# Altium PCB AmbientPro_Main_Board_V1.0.PcbDoc (part 1 of 5)
Units mm, origin at the board's own origin, x right, y up, seen from the top; angles counter-clockwise.
Board outline 100 x 100 mm, 4 copper layers (Top Layer, GND, PWR, Bottom Layer), stack 1.566 mm thick; 176 components, 124 nets, 570 pads, 283 vias.
Unrouted connection lines stored in the file: 133.
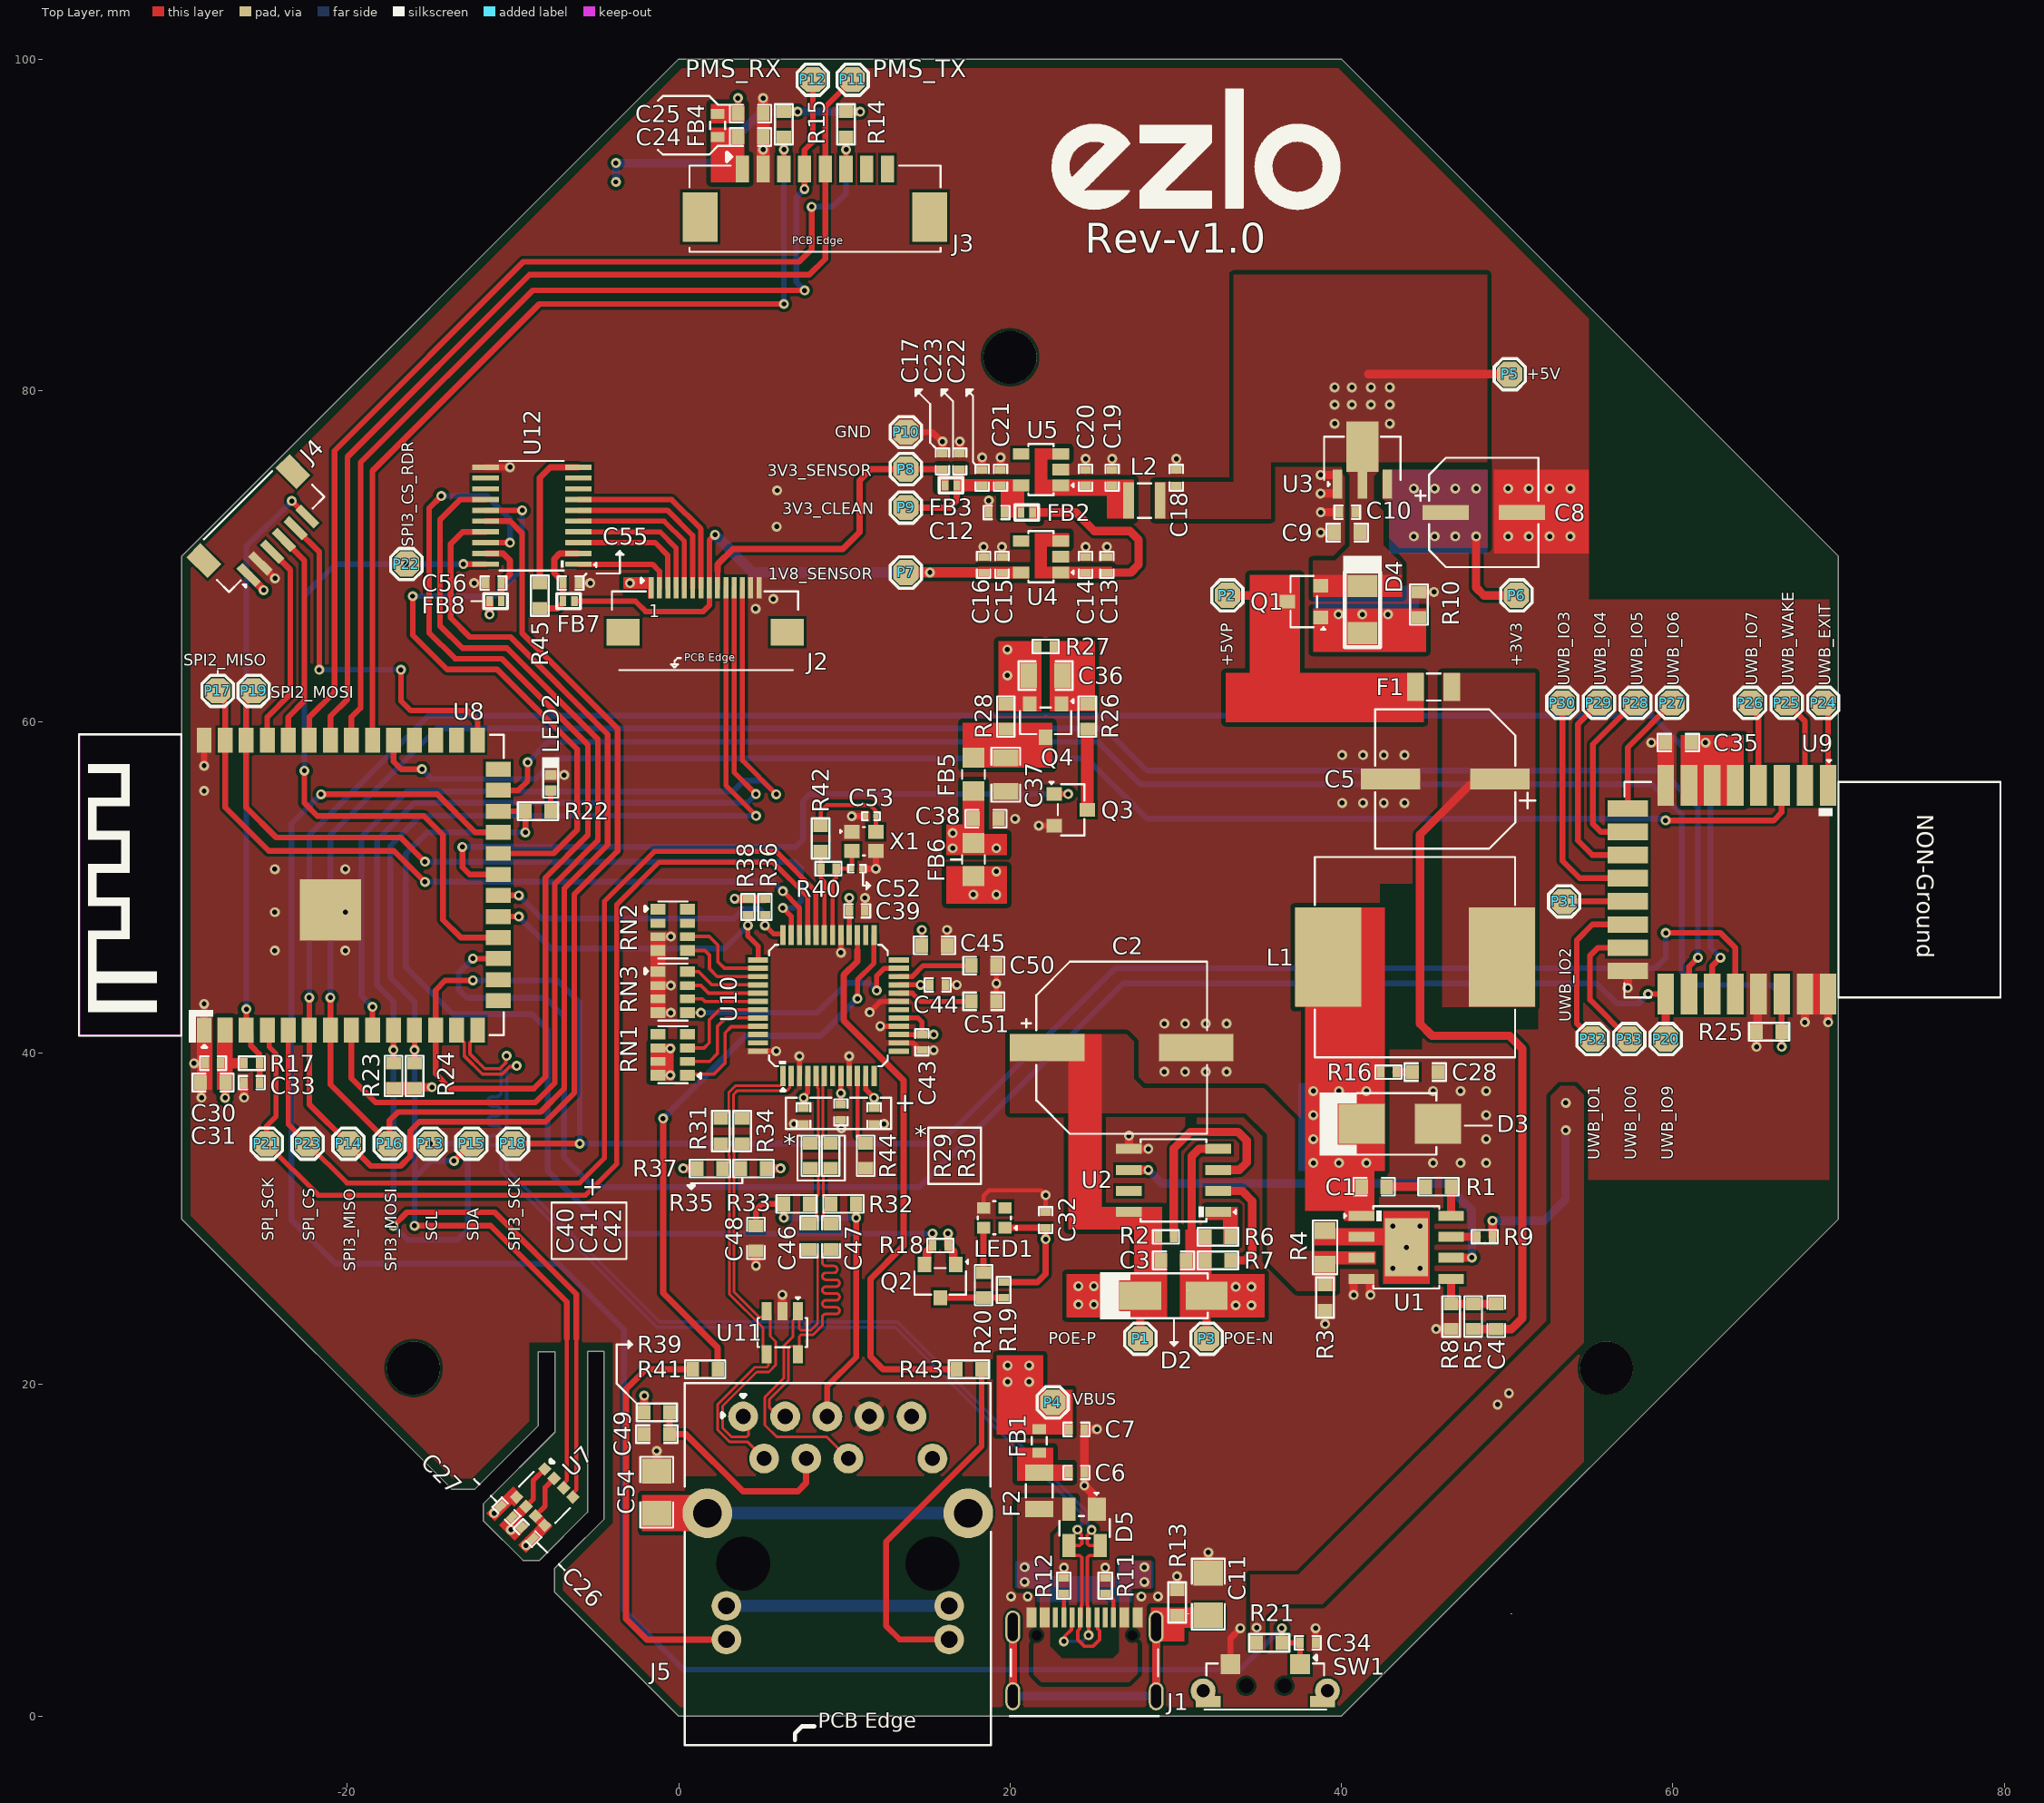
[diagram p0: Top Layer view]
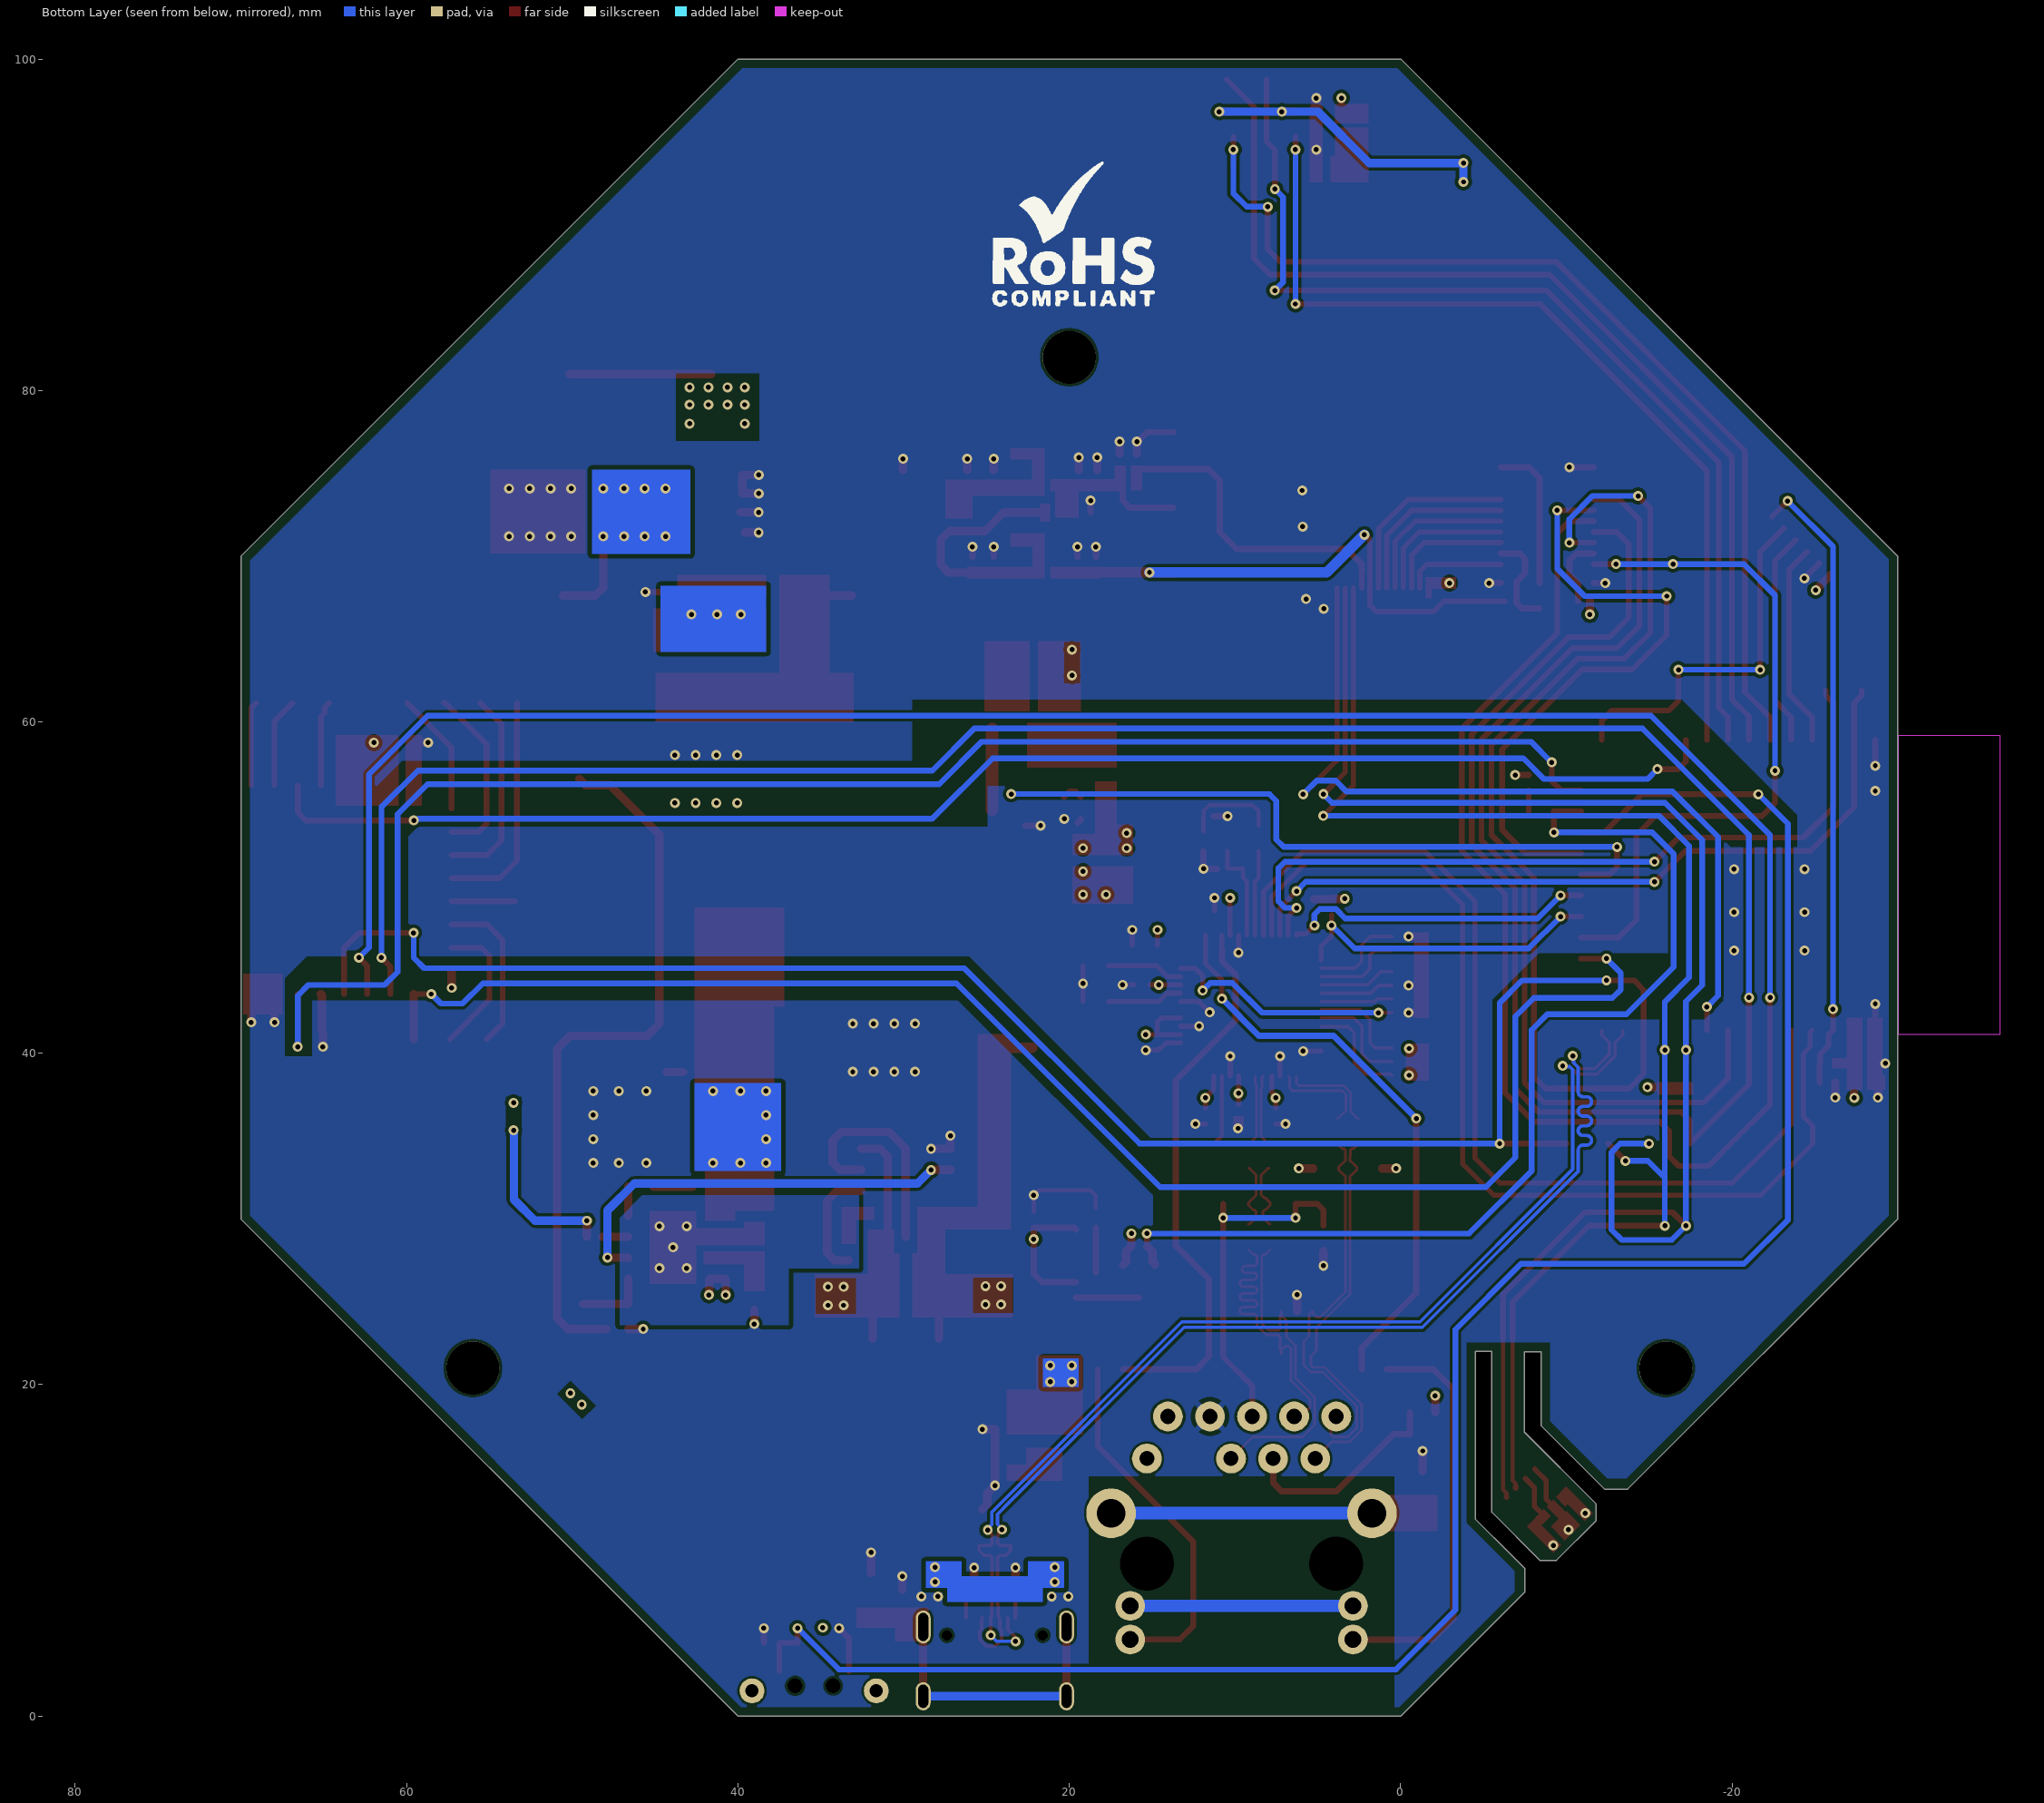
[diagram p1: Bottom Layer view, seen from below]
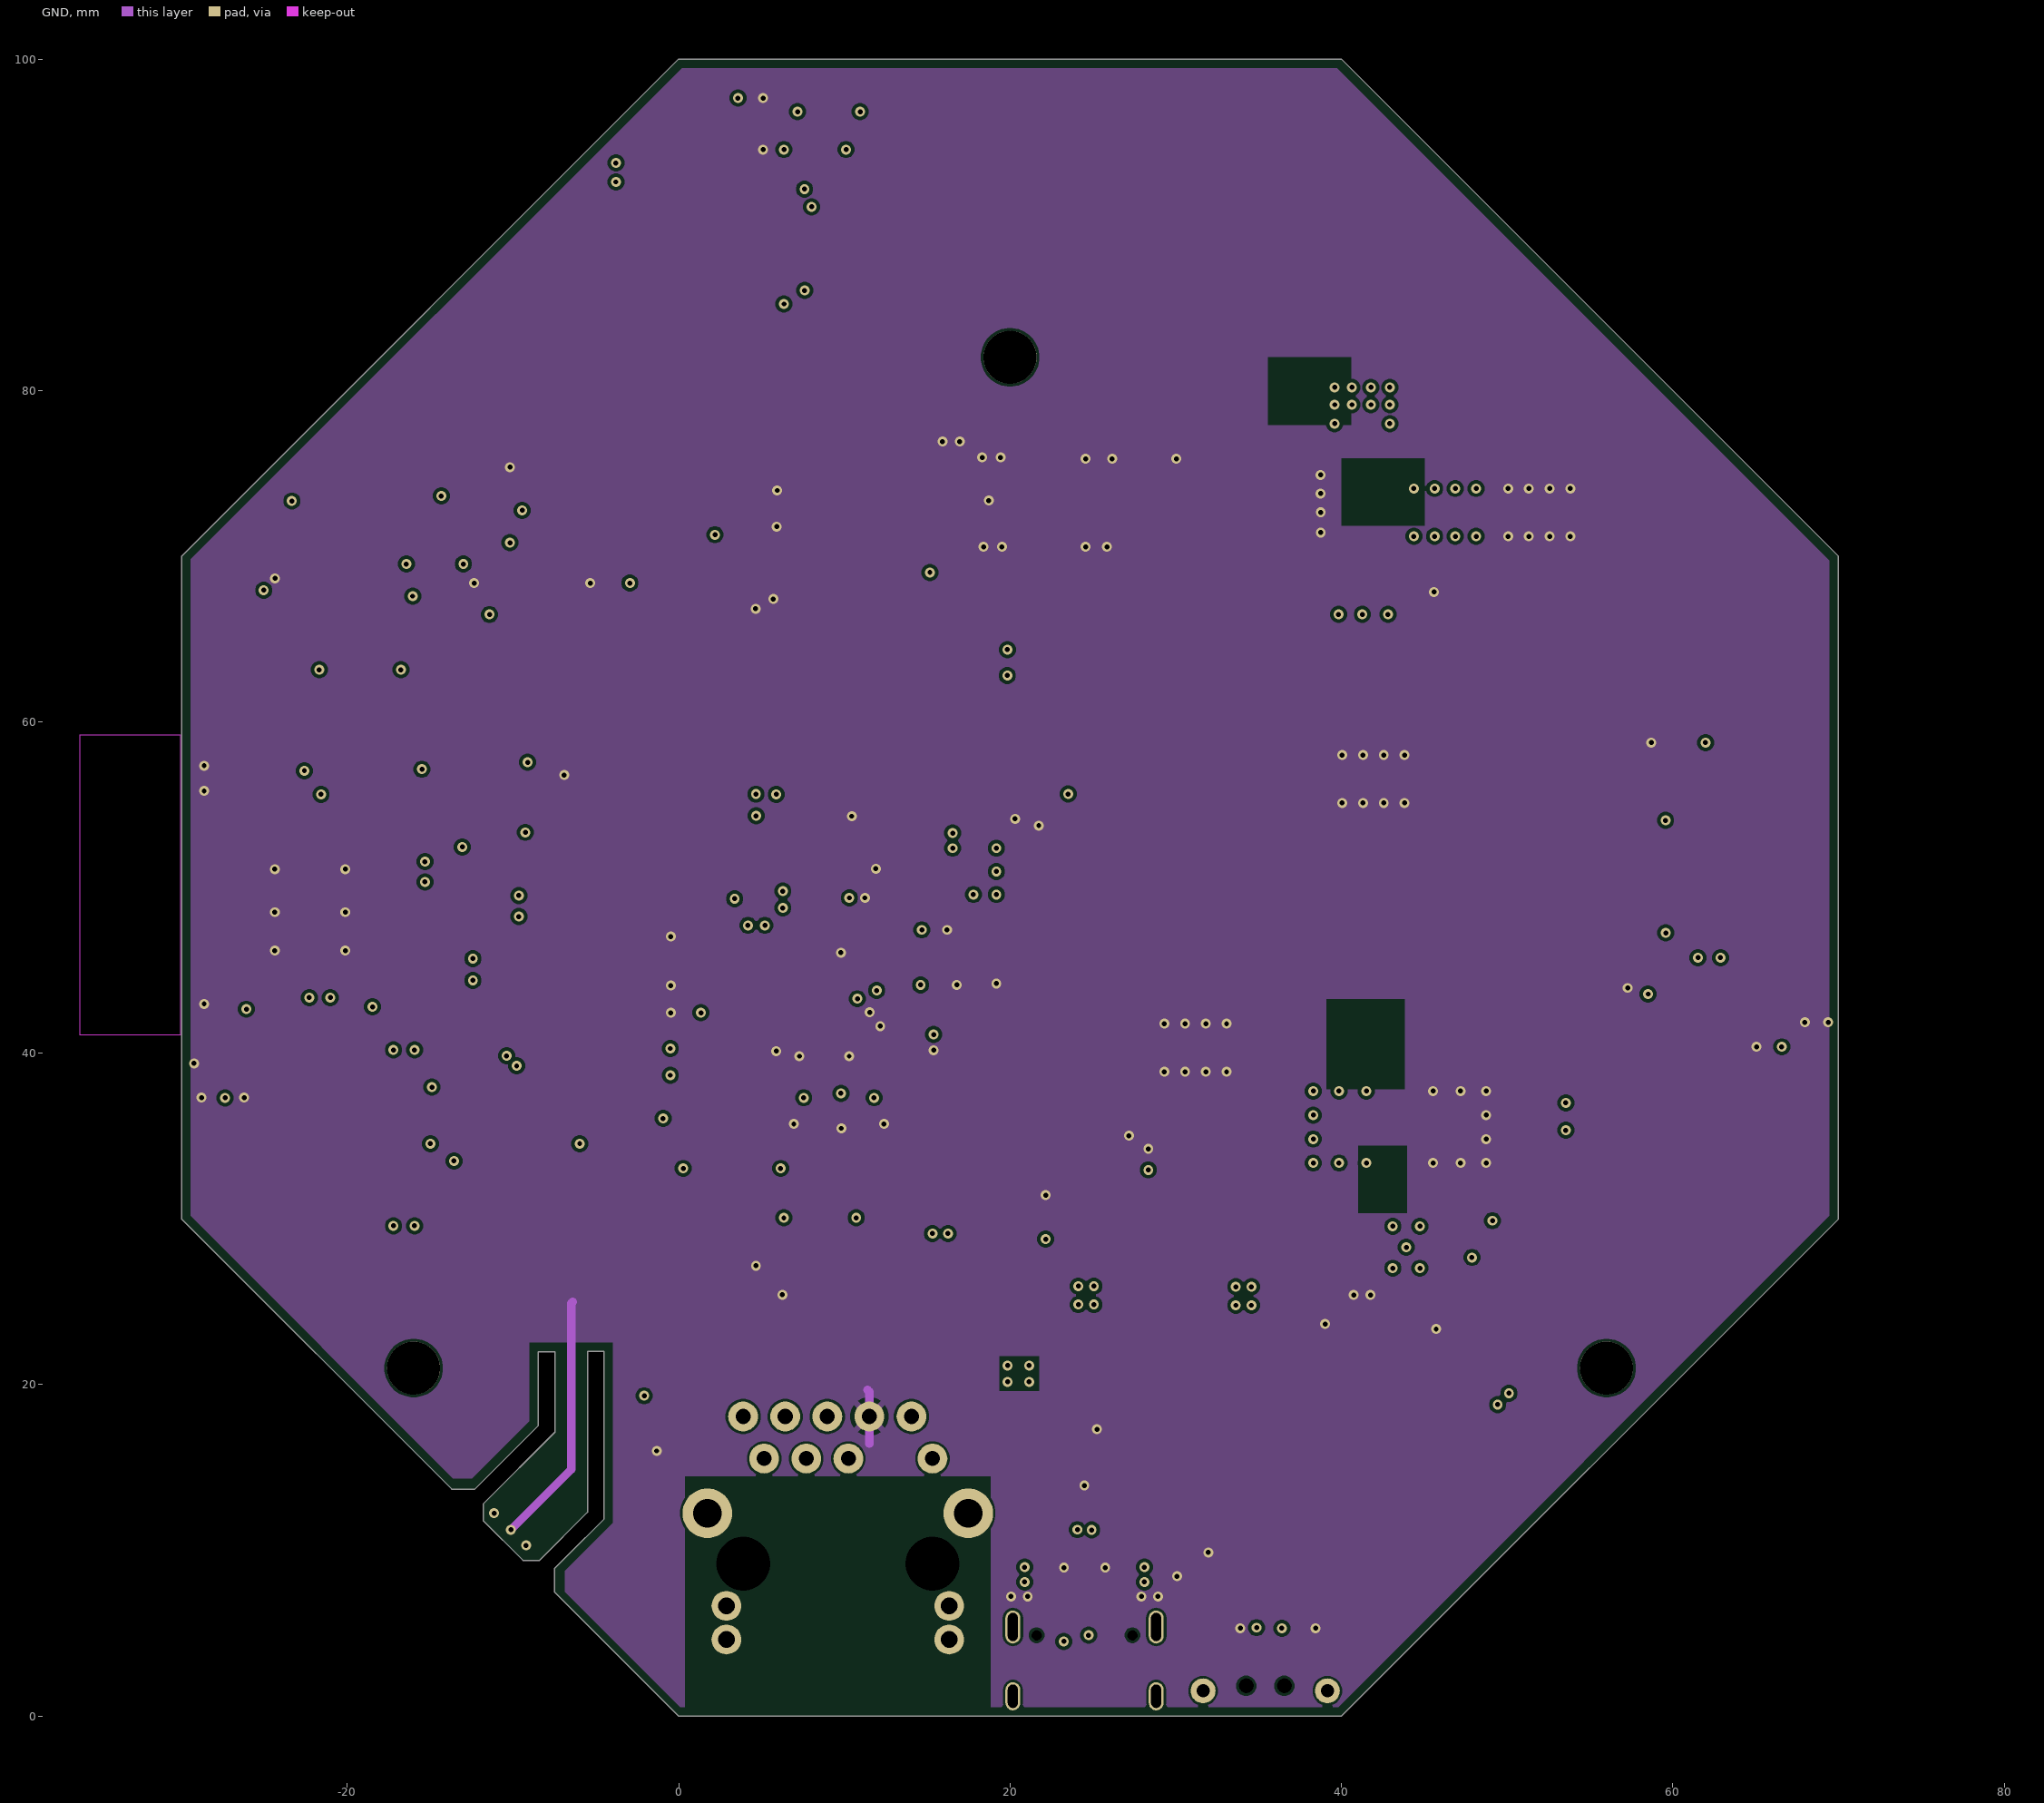
[diagram p2: GND]
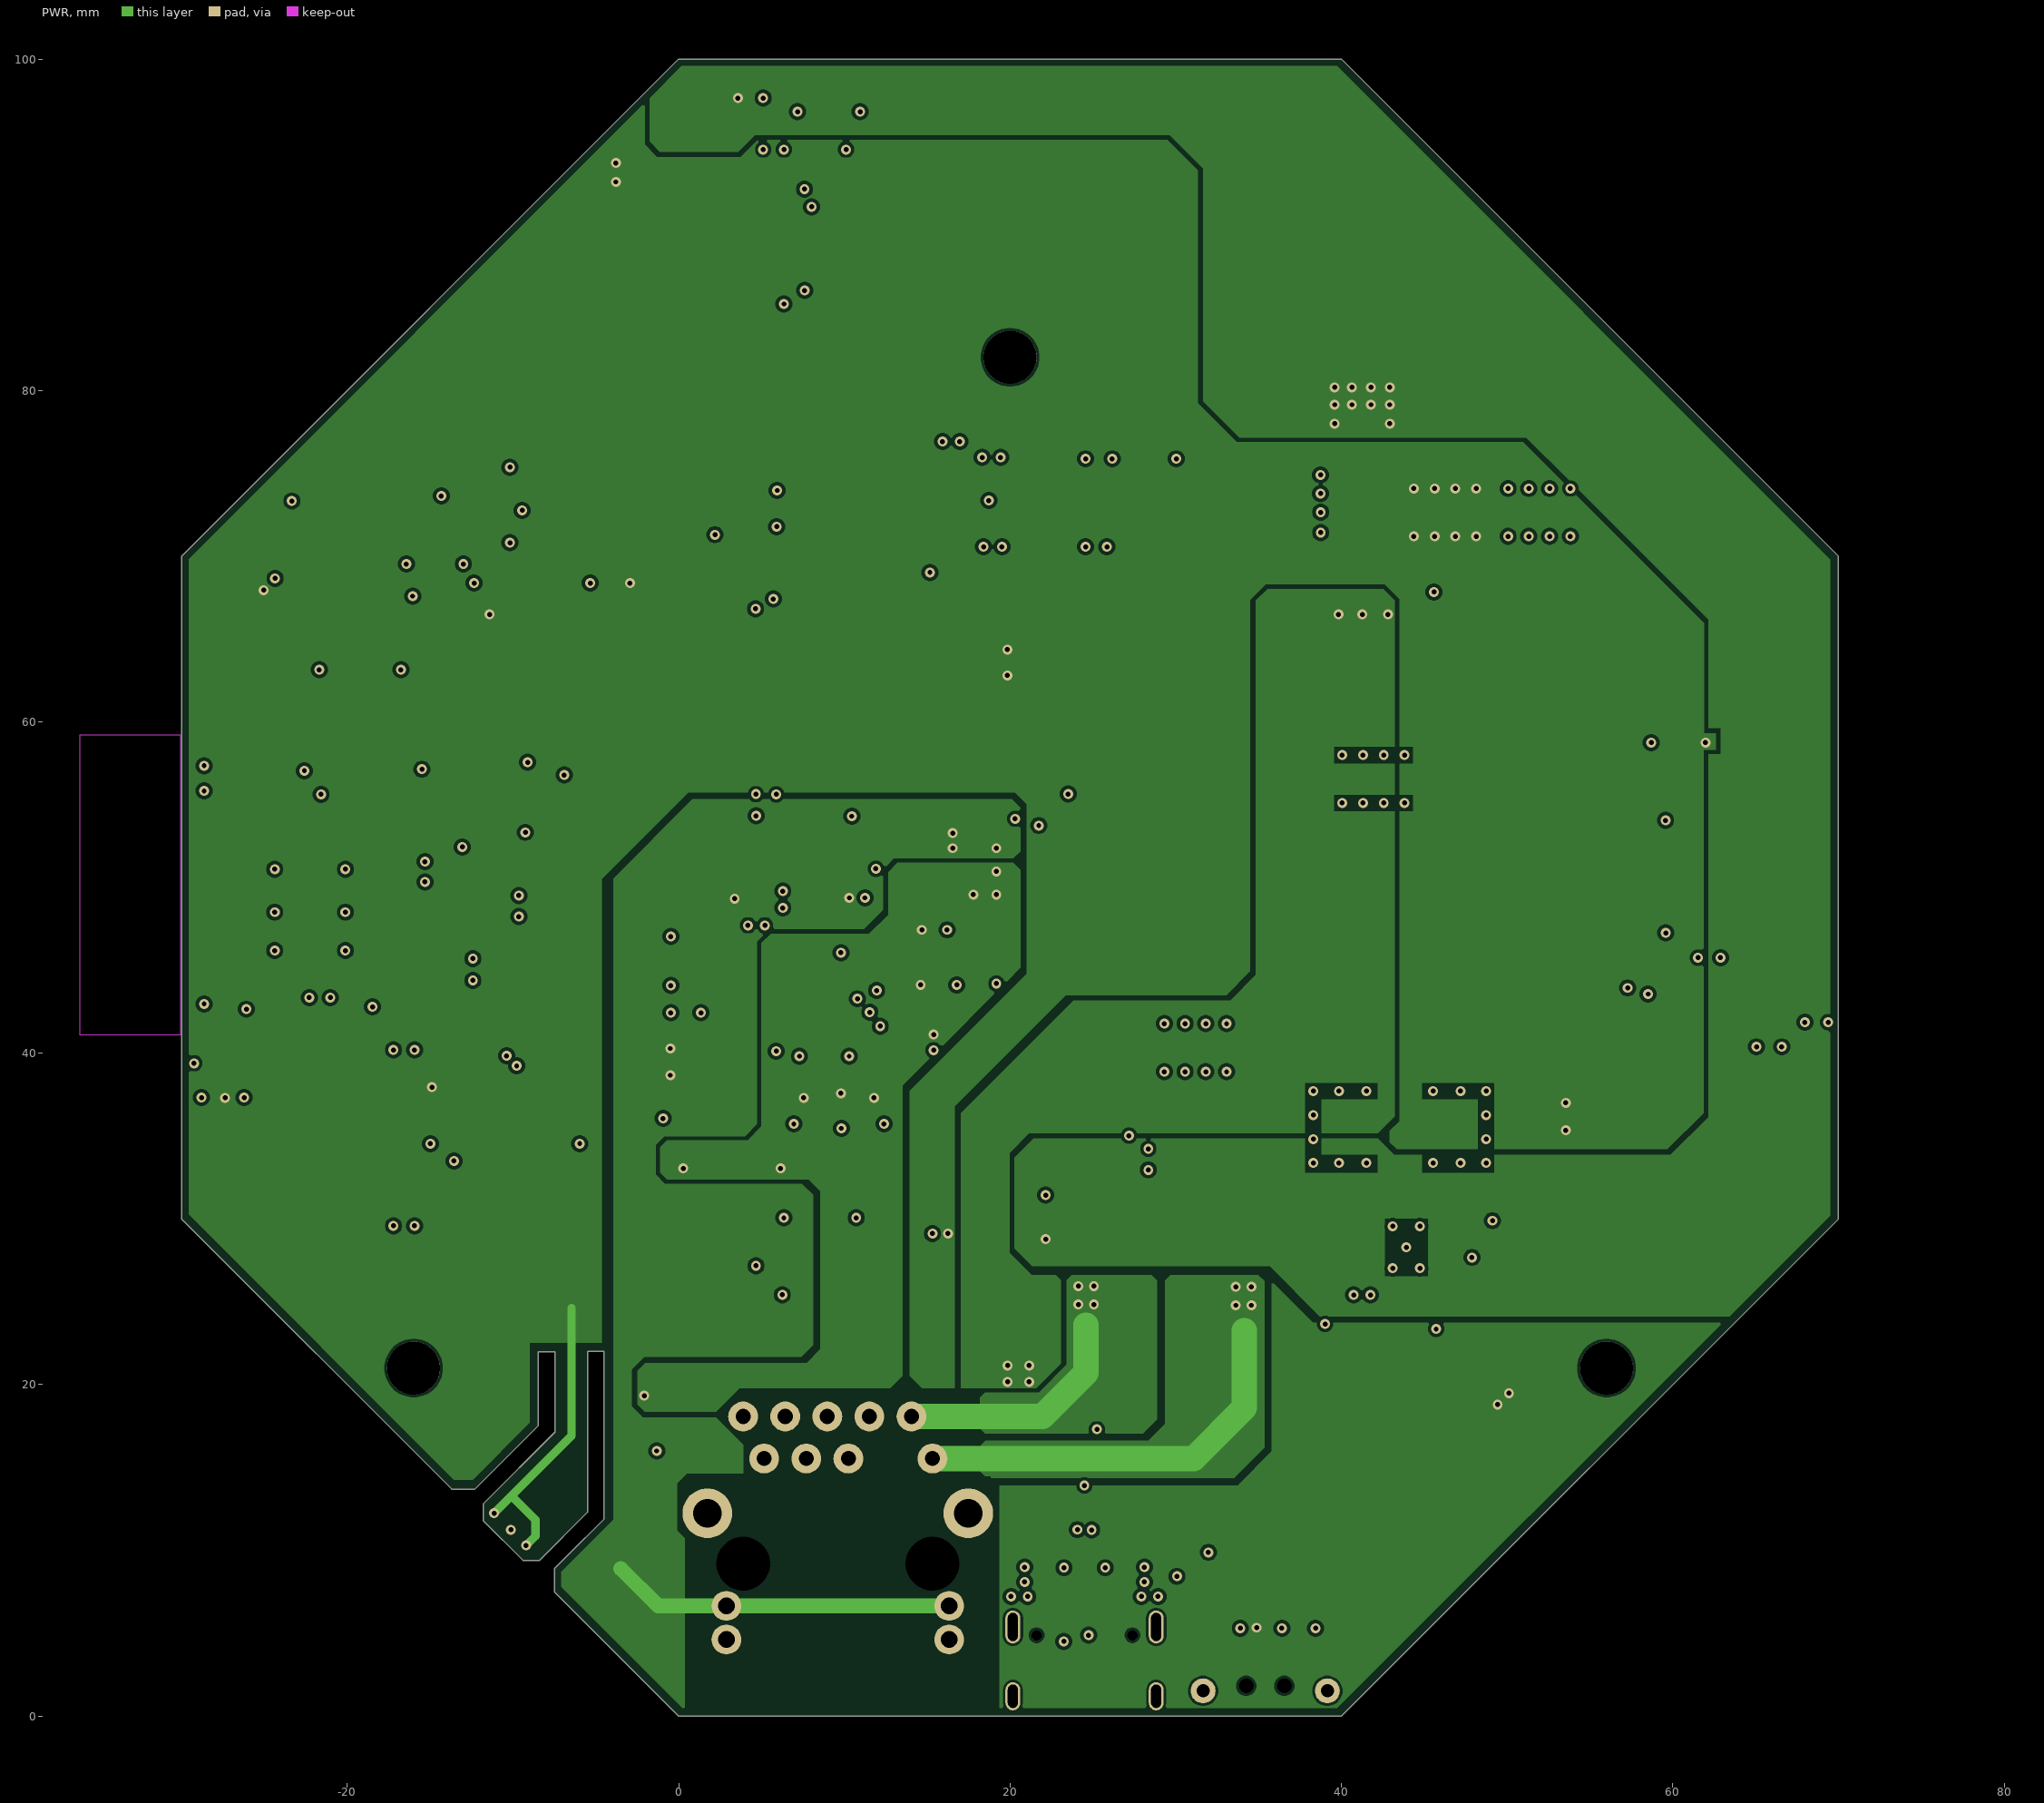
[diagram p3: PWR]
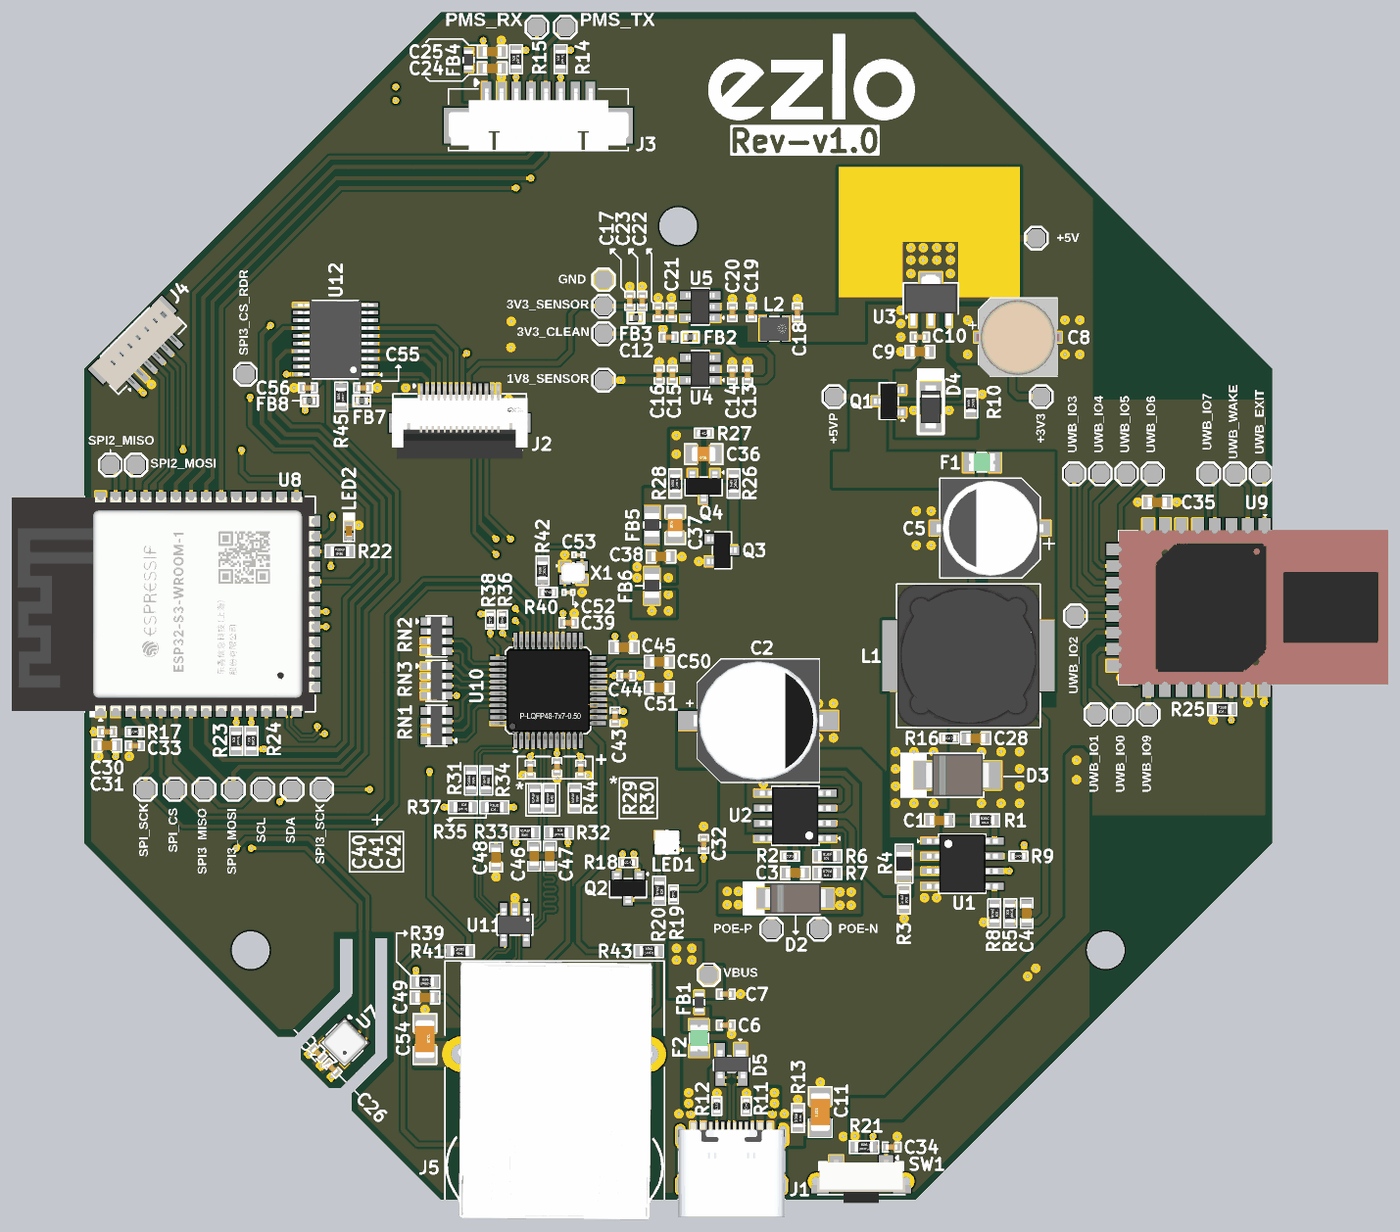
[diagram p6: 3D render of the assembled board from above, using the file's embedded part models]

## Layer stack, top to bottom
Top Solder: solder mask 0.02, Solder Resist, Dk 3.5
Top Layer: signal copper 0.035
Dielectric 2: prepreg 0.203, PP-006, Dk 4.4
GND: signal copper 0.03
Dielectric 1: core 1.03, FR-4, Dk 4.6
PWR: signal copper 0.03
Dielectric 3: prepreg 0.203, PP-006, Dk 4.4
Bottom Layer: signal copper 0.035
Bottom Solder: solder mask 0.02, Solder Resist, Dk 3.5

## Board outline
-9.4,9.4 -8.4,9.4 -5.5,12.3 -5.5,22 -4.5,22 -4.5,11.9 -6.7,9.7 -7.5,8.9 -7.5,7.5 0,0 40,0 70,30 70,70 40,100 0,100 -30,70 -30,30 -13.7,13.7 -12.3,13.7 -8.468,17.532 -8.468,21.988 -7.468,21.988 -7.468,17.132 -11.8,12.8 -11.8,11.8

## Design rules (kind name [scope] priority, off if disabled: settings)
Clearance [All] p1: gap=0.254 ignorepadtopadclearanceinfootprint=TRUE except(0.127: Arc-Track Track-Track; 0.152: Arc-Fill Track-Fill SMDPad-Fill SMDPad-Poly THPad-Poly Via-Fill Fill-Fill Poly-Hole; 0.178: Arc-SMDPad Arc-Poly Track-SMDPad Track-Poly; 0.203: Via-Poly)
ComponentClearance [All] p1: gap=0 collisioncheckmode=3 verticalgap=0.254 showdistances=FALSE
DiffPairsRouting DiffPairsRouting_1 [InDifferentialPairClass('Ethernet_Lines')] p1: maxlimit=0.127 minlimit=0.127 mostfreqgap=0.127 toplayer_minwidth=0.16 toplayer_maxwidth=0.16 toplayer_prefwidth=0.16 midlayer1_minwidth=0.077 midlayer1_maxwidth=0.077 midlayer1_prefwidth=0.077 midlayer2_minwidth=0.077 midlayer2_maxwidth=0.077 midlayer2_prefwidth=0.077 bottomlayer_minwidth=0.16 bottomlayer_maxwidth=0.16 bottomlayer_prefwidth=0.16 impedanceprofiledriven=TRUE impedanceprofileid={59D9FA55-B936-4638-B0E9-643437F8A9E4} impedanceprofilevalue=100.000000 maxuncoupledlength=13.97
DiffPairsRouting [InDifferentialPairClass('USB_Lines')] p2: maxlimit=0.127 minlimit=0.127 mostfreqgap=0.127 toplayer_minwidth=0.203 toplayer_maxwidth=0.203 toplayer_prefwidth=0.203 midlayer1_minwidth=0.116 midlayer1_maxwidth=0.116 midlayer1_prefwidth=0.116 midlayer2_minwidth=0.116 midlayer2_maxwidth=0.116 midlayer2_prefwidth=0.116 bottomlayer_minwidth=0.203 bottomlayer_maxwidth=0.203 bottomlayer_prefwidth=0.203 impedanceprofiledriven=TRUE impedanceprofileid={B601DC1B-281D-4111-9DAA-D49EDDC3BBE4} impedanceprofilevalue=90.000000 maxuncoupledlength=15.24
HoleSize [All] p1: absolutevalues=TRUE maxlimit=3.81 minlimit=0.025 maxpercent=80.000 minpercent=20.000
MatchedLengths "Schematic Matched Net Lengths_1" [InDifferentialPairClass('Ethernet_Lines')] p1: tolerance=0.508 checknetsindiffpair=TRUE checkdiffpairvsdiffpair=FALSE checkxsignals=FALSE checkothers=FALSE
MatchedLengths "Schematic Matched Net Lengths" [InDifferentialPairClass('USB_Lines')] p2: tolerance=0.508 checknetsindiffpair=TRUE checkdiffpairvsdiffpair=FALSE checkxsignals=FALSE checkothers=FALSE
MaxMinImpedance "Schematic Impedance Constraint_1" [InNetClass('Ethernet')] p1: minimum=97.00 maximum=105.0
MaxMinImpedance "Schematic Impedance Constraint" [InNetClass('USB')] p2: minimum=87.00 maximum=92.00
MinimumSolderMaskSliver [All] p1: minsoldermaskwidth=0
PolygonConnect [All] p1: thpad.connectstyle=Relief thpad.reliefconductorwidth=0.381 thpad.reliefentries=4 thpad.polygonreliefangle="45 Angle" thpad.airgapwidth=0.254 smdpad.connectstyle=Direct smdpad.reliefconductorwidth=0.381 smdpad.reliefentries=4 smdpad.polygonreliefangle="90 Angle" smdpad.airgapwidth=0.254 via.connectstyle=Direct via.reliefconductorwidth=0.254 via.reliefentries=4 via.polygonreliefangle="90 Angle" via.airgapwidth=0.254
RoutingVias [All] p1: holewidth=0.3 width=0.6 viastyle="Through Hole" minholewidth=0.3 minwidth=0.6 maxholewidth=0.3 maxwidth=0.6
SilkToSilkClearance [All] p1: silktosilkclearance=0
SilkToSolderMaskClearance [IsPad] p1: minsilkscreentomaskgap=0 clearancetoexposedcopper=TRUE
SolderMaskExpansion [All] p1: expansion=0.102 istentingtop=FALSE
UnRoutedNet [All] p1: checkbadconnections=TRUE
Width [All] p1: maxlimit=1.524 minlimit=0.152 preferedwidth=0.345 minimp=50.000000 maximp=50.000000 favimp=50.000000
23 further rules are at their usual default settings.

## Classes and differential pairs
differential pair class USB_Lines: USB_D
differential pair class Ethernet_Lines: RD TD
net class USB: USB_D_N USB_D_P
net class Ethernet: RD_N RD_P TD_N TD_P
component class U_UWB-Sheet: C35 P24 P25 P26 P27 P28 P29 P30 P31 P32 P33 R25 U9
component class U_Sensor-Sheet: C24 C25 C26 C27 FB4 J2 J3 P11 P12 R14 R15 U7
component class U_Power-Sheet: C1 C2 C3 C4 C5 C6 C7 C8 C9 C10 C11 C12 C13 C14 C15 C16 C17 C18 C19 C20 C21 C22 C23 C28 D2 D3 D4 D5 F1 F2 FB1 FB2 FB3 J1 L1 L2 P1 P2 P3 P4 P5 P6 P7 P8 P9 P10 Q1 R1 R2 R3 R4 R5 R6 R7 R8 R9 R10 R11 R12 R13 R16 U1 U2 U3 U4 U5
component class U_Level_Shifter_Sheet: C C55 C56 FB7 FB8 R45 U12
component class U_Ethernet-Sheet: C36 C37 C38 C39 C40 C41 C42 C43 C44 C45 C46 C47 C48 C49 C50 C51 C52 C53 C54 FB5 FB6 J5 Q3 Q4 R26 R27 R28 R29 R30 R31 R32 R33 R34 R35 R36 R37 R38 R39 R40 R41 R42 R43 R44 RN1 RN2 RN3 U10 U11 X1
component class U_ESP32-Sheet: C30 C31 C32 C33 C34 J4 LED1 LED2 P13 P14 P15 P16 P17 P18 P19 P20 P21 P22 P23 Q2 R17 R18 R19 R20 R21 R22 R23 R24 SW1 U8
differential pair USB_D: +USB_D_P -USB_D_N
differential pair TD: +TD_P -TD_N
differential pair RD: +RD_P -RD_N

## Components (designator, comment, footprint, x,y, rotation, side; value= is the part's Value field where it differs from the comment)
C1 "0.1uF" Cap-0603 41.984,31.948 r0 top locked
C2 "15uF" UD2C150M1010 26.741,40.335 r0 top locked
C3 "0.1uF" Cap-0603 29.868,27.501 r180 top locked
C4 "12pF" Cap-0603 49.35,24.114 r270 top locked
C5 "470uF" VZH471M1CTR-0810 46.27,56.55 r180 top
C6 "0.1uF" Cap-0402 24.017,14.69 r180 top locked
C7 "0.1uF" Cap-0402 24.017,17.304 r180 top locked
C8 "100uF" UCD1A101MCL1GS 48.602,72.637 r0 top locked
C9 "10uF" Cap-0603 40.353,71.426 r180 top locked
C10 "0.1uF" Cap-0402 40.353,72.645 r0 top locked
C11 "4.7nF" Cap-1206 31.967,7.369 r90 top locked
C12 "0.1uF" Cap-0402 19.19,72.631 r0 top locked
C13 "10uF" Cap-0402 25.845,69.482 r270 top locked
C14 "0.1uF" Cap-0402 24.562,69.482 r270 top locked
C15 "0.1uF" Cap-0402 19.516,69.482 r270 top locked
C16 "10uF" Cap-0402 18.399,69.482 r270 top locked
C17 "0.1uF" Cap-0402 15.926,75.717 r270 top locked
C18 "10uF" Cap-0402 30.038,74.731 r270 top locked
C19 "10uF" Cap-0402 26.162,74.739 r270 top locked
C20 "0.1uF" Cap-0402 24.562,74.739 r270 top locked
C21 "0.1uF" Cap-0402 19.431,74.739 r270 top locked
C22 "10uF" Cap-0402 18.313,74.739 r270 top locked
C23 "0.1uF" Cap-0402 16.967,75.717 r270 top locked
C24 "10uF" Cap-0603 4.338,95.301 r180 top locked
C25 "10uF" Cap-0603 4.338,96.701 r180 top locked
C26 "0.1uF" Cap-0402 -9.127,11.055 r315 top locked
C27 "0.1uF" Cap-0402 -10.397,12.344 r135 top locked
C28 "DNP" Cap-0603 45.06,38.862 r180 top
C30 "22uF" Cap-0603 -28.104,38.227 r0 top locked
C31 "0.1uF" Cap-0402 -28.104,39.395 r0 top locked
C32 "0.1uF" Cap-0402 22.149,29.939 r90 top locked
C33 "1uF" Cap-0402 -25.761,38.227 r0 top locked
C34 "0.1uF" Cap-0402 37.972,4.42 r180 top locked
C35 "0.1uF" Cap-0603 60.339,58.75 r180 top locked
C36 "22uF" Cap-0805 22.145,62.795 r180 top locked
C37 "22uF" Cap-0805 19.745,56.811 r90 top locked
C38 "10uF" Cap-0603 18.551,54.153 r180 top locked
C39 "0.1uF" Cap-0402 10.772,48.589 r180 top locked
C40 "0.1uF" Cap-0402 7.541,36.208 r90 top locked
C41 "0.1uF" Cap-0402 9.79,36.436 r90 top locked
C42 "0.1uF" Cap-0402 11.79,36.208 r90 top locked
C43 "0.1uF" Cap-0402 14.679,40.658 r90 top locked
C44 "0.1uF" Cap-0402 15.631,44.128 r180 top locked
C45 "10uF" Cap-0603 15.441,46.518 r180 top locked
C46 "6.8nF" Cap-0603 7.872,28.924 r90 top locked
C47 "6.8nF" Cap-0603 9.19,28.924 r90 top locked
C48 "10nF" Cap-0603 4.664,28.829 r90 top locked
C49 "22nF" Cap-0603 -1.321,17.018 r180 top locked
C50 "10nF" Cap-0603 18.412,45.288 r180 top locked
C51 "4.7uF" Cap-0603 18.412,43.128 r180 top locked
C52 "12pF" CAP-0201 10.752,51.14 r180 top locked
C53 "12pF" CAP-0201 11.602,54.305 r0 top locked
C54 "1000pF" Cap-1206 -1.321,13.51 r270 top locked
C55 "0.1uF" Cap-0402 -6.52,68.377 r180 top locked
C56 "0.1uF" Cap-0402 -11.18,68.377 r0 top locked
D2 "SMAJ58A" SMA 29.868,25.367 r0 top locked
D3 "SS510B" SMB_ 43.522,35.738 r180 top
D4 "PMEG4030ER" SOD-123FL 41.267,66.772 r270 top locked
D5 "SP0503BAHTG" SOT-143-4_ 25.247,12.49 r270 top locked
F1 "BSMD0805L-200" Fuse-0805 45.568,62.103 r180 top
F2 "BSMD0805L-200" Fuse-0805 21.764,13.59 r90 top locked
FB1 "BLM18SG121TN1D" "IND-0603 (1608 Metric)" 21.764,16.604 r90 top locked
FB2 "BLM15PD121SN1D" IND-0402 21.013,72.631 r0 top locked
FB3 "BLM15PD121SN1D" IND-0402 16.439,74.27 r180 top locked
FB4 "BLM18SG121TN1D" "IND-0603 (1608 Metric)" 2.35,96.001 r270 top locked
FB5 "CBM201209U601T" Ind-0805 17.789,56.827 r270 top locked
FB6 "CBM201209U601T" Ind-0805 17.789,51.696 r270 top locked
FB7 "BLM15PD121SN1D" IND-0402 -6.64,67.285 r180 top locked
FB8 "BLM15PD121SN1D" IND-0402 -11.06,67.285 r0 top locked
J1 "TYPE-C-31-M-12" TYPE-C-31-M-12_ 24.496,3.572 r0 top locked
J2 "AFC01-S14FCC-00" AFC01-S14FCC-00 1.595,66.752 r0 top locked
J3 "0532610871" 53261-0871 8.225,91.915 r0 top locked
J4 "Voltlink Target" "Voltlink Target" -25.077,71.517 r45 top locked
J5 "HR873170C" HR873170C 3.89,9.19 r180 top locked
L1 "33uH" CYH127-33UH 44.442,45.796 r0 top
L2 "10uH" "IND-1008 (2520 Metric)" 28.108,73.355 r180 top locked
LED1 "SK6812-EC20" SK6812-EC20 19.053,30.069 r0 top locked
LED2 "XZVG68W-2" LED-0402 -7.727,56.321 r90 top locked
P1 "TEST POINT" Test-point 27.868,22.776 r90 top locked
P2 "TEST POINT" Test-point 33.119,67.633 r0 top
P3 "TEST POINT" Test-point 31.868,22.776 r90 top locked
P4 "TEST POINT" Test-point 22.576,18.926 r0 top locked
P5 "TEST POINT" Test-point 50.162,80.981 r0 top locked
P6 "TEST POINT" Test-point 50.569,67.633 r0 top locked
P7 "TEST POINT" Test-point 13.716,69.012 r0 top locked
P8 "TEST POINT" Test-point 13.716,75.248 r0 top locked
P9 "TEST POINT" Test-point 13.716,72.936 r0 top locked
P10 "TEST POINT" Test-point 13.716,77.483 r0 top locked
P11 "TEST POINT" Test-point 10.5,98.755 r0 top
P12 "TEST POINT" Test-point 8.095,98.755 r0 top
P13 "TEST POINT" Test-point -14.983,34.544 r0 top locked
P14 "TEST POINT" Test-point -19.925,34.544 r0 top locked
P15 "TEST POINT" Test-point -12.512,34.544 r0 top locked
P16 "TEST POINT" Test-point -17.454,34.544 r0 top locked
P17 "TEST POINT" Test-point -27.824,61.874 r0 top locked
P18 "TEST POINT" Test-point -10.008,34.544 r0 top locked
P19 "TEST POINT" Test-point -25.654,61.874 r0 top locked
P20 "TEST POINT" Test-point 59.577,40.856 r0 top locked
P21 "TEST POINT" Test-point -24.867,34.544 r0 top locked
P22 "TEST POINT" Test-point -16.434,69.52 r0 top
P23 "TEST POINT" Test-point -22.396,34.544 r0 top locked
P24 "TEST POINT" Test-point 69.088,61.138 r0 top locked
P25 "TEST POINT" Test-point 66.883,61.138 r0 top locked
P26 "TEST POINT" Test-point 64.677,61.138 r0 top locked
P27 "TEST POINT" Test-point 59.958,61.138 r0 top
P28 "TEST POINT" Test-point 57.753,61.138 r0 top
P29 "TEST POINT" Test-point 55.548,61.138 r0 top
P30 "TEST POINT" Test-point 53.343,61.138 r0 top
P31 "TEST POINT" Test-point 53.447,49.167 r0 top
P32 "TEST POINT" Test-point 55.167,40.856 r0 top
P33 "TEST POINT" Test-point 57.372,40.856 r0 top
Q1 "SI2323DS" SOT-23 37.746,67.252 r90 top locked
Q2 "Si2302CDS" Sot-23 15.786,26.248 r180 top locked
Q3 "LMUN2211LT1G" SOT-23 23.672,54.693 r270 top locked
Q4 "WPM2015-3/TR" Sot-23 22.145,60.078 r180 top locked
R1 "4.7R" Res-0603 45.86,31.948 r0 top locked
R2 "24.9K" Res-0402 29.411,28.923 r180 top locked
R3 "4.7K" Res-0603 39.016,25.261 r90 top locked
R4 "30mR" RES-0805 39.014,28.287 r270 top locked
R5 "301R" Res-0603 47.953,24.114 r270 top locked
R6 "180K" Res-0603 32.555,28.923 r0 top locked value=180kR
R7 "4.42K" Res-0603 32.555,27.501 r0 top locked value=4.42kR
R8 "57.6K" Res-0603 46.622,24.114 r90 top locked
R9 "10K" Res-0402 48.652,28.926 r0 top locked
R10 "100K" Res-0603 44.676,67.074 r270 top locked
R11 "5.1K" Res-0402 25.746,7.874 r270 top locked
R12 "5.1K" Res-0402 23.246,7.874 r270 top locked
R13 "1M" Res-0603 30.088,6.861 r90 top locked
R14 "10K" Res-0603 10.1,96.063 r270 top locked
R15 "10K" Res-0603 6.35,96.063 r270 top locked
R16 "DNP" Res-0402 42.837,38.862 r180 top
R17 "10K" Res-0402 -25.761,39.395 r180 top locked
R18 "10K" Res-0402 15.786,28.397 r180 top locked
R19 "10K" Res-0402 19.609,25.717 r270 top locked
R20 "1K" Res-0603 18.403,26.01 r90 top locked
R21 "10K" Res-0603 35.642,4.42 r180 top locked
R22 "1K" Res-0603 -8.489,54.601 r0 top locked
R23 "4.7K" Res-0603 -17.214,38.633 r270 top locked
R24 "4.7K" Res-0603 -15.944,38.633 r270 top locked
R25 "100K" Res-0603 65.815,41.3 r0 top locked
R26 "1K" Res-0603 24.672,60.316 r270 top locked
R27 "10K" Res-0402 22.145,64.548 r0 top locked
R28 "DNP" Res-0603 19.745,60.316 r270 top locked
R29 "33R" Res-0603 7.95,33.81 r90 top locked
R30 "33R" Res-0603 9.169,33.81 r90 top locked
R31 "33R" Res-0603 2.544,35.309 r90 top locked
R32 "49.9R" Res-0603 9.952,30.905 r180 top locked
R33 "49.9R" Res-0603 7.11,30.905 r0 top locked
R34 "33R" Res-0603 3.833,35.309 r90 top locked
R35 "49.9R" Res-0603 4.519,33.048 r0 top locked
R36 "10K" Res-0402 5.204,48.83 r270 top locked
R37 "49.9R" Res-0603 1.877,33.048 r180 top locked
R38 "10K" Res-0402 4.18,48.83 r270 top locked
R39 "10R" Res-0603 -1.321,18.334 r180 top locked
R40 "1M" Res-0402 9.042,51.14 r180 top locked
R41 "330R" Res-0603 1.6,20.93 r0 top locked
R42 "0R" Res-0603 8.573,52.968 r270 top locked
R43 "330R" Res-0603 17.526,20.93 r180 top locked
R44 "12.4K" Res-0603 11.29,33.81 r90 top locked
R45 "0R" Res-0603 -8.387,67.615 r270 top locked
RN1 "10K" YC164-FR-0710KL 0.531,38.672 r180 top locked value=10kR
RN2 "10K" YC164-FR-0710KL -1.239,48.685 r0 top locked value=10kR
RN3 "10K" YC164-FR-0710KL -1.239,44.928 r0 top locked value=10kR
SW1 "YTS-B003-2A" YTS-B003-2A 35.403,2 r180 top locked
U1 "TX4138" 8-SOIC-EP 43.922,28.291 r0 top locked
U2 "TPS2375DR" SOIC-8 29.868,32.327 r180 top locked
U3 "LR1107G-33-AB3-C-R" SOT-89-3 41.267,75.479 r0 top locked
U4 "XC6228D182VR-G" SOT-25-5 21.863,69.962 r180 top locked
U5 "XC6228D332VR-G" SOT-25-5 21.863,75.22 r180 top locked
U7 "BME680" BME680 -8.084,13.212 r45 top locked
U8 "ESP32-S3-WROOM-1-N16R8" "41-SMD Module" -19.764,50.151 r90 top locked
U9 "DWM3000-ESSR" DWM3000_ESSR 63.33,49.867 r270 top locked
U10 "W5500" "48-LQFP (7x7)_" 9.04,42.878 r90 top locked
U11 "SP0504BAHTG" SOT-23-5 6.254,23.144 r270 top locked value=30pF
U12 "TXS0108EPWR" TSSOP-20 -8.85,72.439 r180 top locked
X1 "25MHz" Q22FA12800090 10.452,53.356 r0 top locked

## Footprints (in the part's own frame and the unit in brackets; to place one, negate y for a bottom-side part, rotate by r counter-clockwise, add the part's x,y. Pads: shape width x height; smd on the part's side, far side on the other; paste and mask are expansions set on the pad)
8-SOIC-EP [mm]
  rect 1.55x0.6 smd: 1(-2.7,1.905) 2(-2.7,0.635) 3(-2.7,-0.635) 4(-2.7,-1.905) 5(2.7,-1.905) 6(2.7,-0.635) 7(2.7,0.635) 8(2.7,1.905)
  rect 2.613x3.502 smd: 9(0,0)
  silkscreen extent -3.76,-2.49 1.99,2.49, body extent -3,-2.45 3,2.45, height 1.7
"41-SMD Module" [mm]
  rect 1.5x0.9 smd: 1(-8.75,8.88) 2(-8.75,7.61) 3(-8.75,6.34) 4(-8.75,5.07) 5(-8.75,3.8) 6(-8.75,2.53) 7(-8.75,1.26) 8(-8.75,-0.01) 9(-8.75,-1.28) 10(-8.75,-2.55) 11(-8.75,-3.82) 12(-8.75,-5.09) 13(-8.75,-6.36) 14(-8.75,-7.63) 27(8.75,-7.63) 28(8.75,-6.36) 29(8.75,-5.09) 30(8.75,-3.82) 31(8.75,-2.55) 32(8.75,-1.28) 33(8.75,-0.01) 34(8.75,1.26) 35(8.75,2.53) 36(8.75,3.8) 37(8.75,5.07) 38(8.75,6.34) 39(8.75,7.61) 40(8.75,8.88)
  rect 0.9x1.5 smd: 15(-6.98,-8.88) 16(-5.71,-8.88) 17(-4.44,-8.88) 18(-3.17,-8.88) 19(-1.9,-8.88) 20(-0.63,-8.88) 21(0.64,-8.88) 22(1.91,-8.88) 23(3.18,-8.88) 24(4.45,-8.88) 25(5.72,-8.88) 26(6.99,-8.88)
  rect 3.7x3.7 smd: 41(-1.5,1.26)
  Keep-Out Layer region: -9.042,10.287 9.043,10.287 9.043,16.383 -9.042,16.383
  silkscreen extent -9.8,-9.2 9.09,16.43, body extent -9.01,-9.14 9.01,16.37, height 3.16
"48-LQFP (7x7)_" [mm]
  rect 1.22x0.32 smd: 1(-4.25,2.75) 2(-4.25,2.25) 3(-4.25,1.75) 4(-4.25,1.25) 5(-4.25,0.75) 6(-4.25,0.25) 7(-4.25,-0.25) 8(-4.25,-0.75) 9(-4.25,-1.25) 10(-4.25,-1.75) 11(-4.25,-2.25) 12(-4.25,-2.75) 25(4.25,-2.75) 26(4.25,-2.25) 27(4.25,-1.75) 28(4.25,-1.25) 29(4.25,-0.75) 30(4.25,-0.25) 31(4.25,0.25) 32(4.25,0.75) 33(4.25,1.25) 34(4.25,1.75) 35(4.25,2.25) 36(4.25,2.75)
  rect 0.32x1.22 smd: 13(-2.75,-4.25) 14(-2.25,-4.25) 15(-1.75,-4.25) 16(-1.25,-4.25) 17(-0.75,-4.25) 18(-0.25,-4.25) 19(0.25,-4.25) 20(0.75,-4.25) 21(1.25,-4.25) 22(1.75,-4.25) 23(2.25,-4.25) 24(2.75,-4.25) 37(2.75,4.25) 38(2.25,4.25) 39(1.75,4.25) 40(1.25,4.25) 41(0.75,4.25) 42(0.25,4.25) 43(-0.25,4.25) 44(-0.75,4.25) 45(-1.25,4.25) 46(-1.75,4.25) 47(-2.25,4.25) 48(-2.75,4.25)
  silkscreen extent -5.16,-3.58 3.66,3.58, body extent -4.51,-4.51 4.49,4.49, height 1.43
53261-0871 [mm]
  rect 0.8x1.6 smd mask+0.076: 1(-4.375,1.45) 2(-3.125,1.45) 3(-1.875,1.45) 4(-0.625,1.45) 5(0.625,1.45) 6(1.875,1.45) 7(3.125,1.45) 8(4.375,1.45)
  rect 2.1x3 smd mask+0.076: S1(-6.925,-1.45) S2(6.925,-1.45)
  silkscreen extent -7.57,-3.55 7.57,2.44, body extent -7.55,-3.51 7.6,1.69, height 3.4
AFC01-S14FCC-00 [mm]
  rect 0.3x1.3 smd: 1(-3.25,1.34) 2(-2.75,1.34) 3(-2.25,1.34) 4(-1.75,1.34) 5(-1.25,1.34) 6(-0.75,1.34) 7(-0.25,1.34) 8(0.25,1.34) 9(0.75,1.34) 10(1.25,1.34) 11(1.75,1.34) 12(2.25,1.34) 13(2.75,1.34) 14(3.25,1.34)
  rect 2x1.6 smd: MP1(-4.95,-1.34) MP2(4.95,-1.34)
  silkscreen extent -5.62,-3.63 5.62,1.91, body extent -5.75,-4.35 5.75,1.75, height 2.01
BME680 [mm]
  rect 0.6x0.6 smd: 1(1.2,1.2) 2(1.2,0.4) 3(1.2,-0.4) 4(1.2,-1.2) 5(-1.2,-1.2) 6(-1.2,-0.4) 7(-1.2,0.4) 8(-1.2,1.2)
  silkscreen extent -0.64,-1.55 1.85,1.55, body extent -1.5,-1.5 1.5,1.5, height 1
CAP-0201 [mm]
  rect 0.3x0.3 smd mask+0.055: 1(-0.3,0) 2(0.3,0)
  silkscreen extent -0.53,-0.23 0.53,0.23, body extent -0.3,-0.15 0.3,0.15, height 0.28
Cap-0402 [mil]
  rect 18x25 smd mask+2.36: 1(-18.5,0) 2(18.5,0)
  silkscreen extent -31,-16 31,16, body extent -20,-10 20,10, height 19
Cap-0603 [mil]
  rect 30x35 smd mask+2.36: 1(-30,0) 2(30,0)
  silkscreen extent -49,-21 49,21, body extent -32,-16 31,16, height 34
Cap-0805 [mil] "SMD 0805"
  rect 40x60 smd mask+2.76: 1(-40,0) 2(40,0)
  silkscreen extent -64,-34 64,34, body extent -39,-25 39,25, height 30
Cap-1206 [mil] "SMD 1206"
  rect 60x70 smd: 1(-50,0) 2(50,0)
  silkscreen extent -84,-39 84,39, body extent -63,-31 63,32, height 39
CYH127-33UH [mm]
  rect 4x6 smd mask+0.055: 1(-5.25,0) 2(5.25,0)
  silkscreen extent -6.05,-6.05 6.05,6.05, body extent -6,-6 6,6, height 7.98
DWM3000_ESSR [mm]
  rect 2.45x1 smd: 1(-6.295,6.048) 2(-6.295,4.648) 3(-6.295,3.248) 4(-6.295,1.848) 5(-6.295,0.448) 6(-6.295,-0.953) 7(-6.295,-2.352) 8(-6.295,-3.752) 17(6.295,-3.752) 18(6.295,-2.352) 19(6.295,-0.952) 20(6.295,0.447) 21(6.295,1.847) 22(6.295,3.248) 23(6.295,4.647) 24(6.295,6.048)
  rect 1x2.45 smd: 9(-4.9,-6.047) 10(-3.5,-6.047) 11(-2.1,-6.047) 12(-0.7,-6.047) 13(0.7,-6.047) 14(2.1,-6.047) 15(3.5,-6.047) 16(4.9,-6.047)
  silkscreen extent -7.82,-6.25 6.5,16.45, body extent -6.5,-6.24 6.5,16.46, height 2.69
Fuse-0805 [mm]
  rect 1x1.7 smd: 1(-1.1,0) 2(1.1,0)
  silkscreen extent -0.41,-0.81 0.41,0.81, body extent -1.1,-0.75 1.1,0.75, height 1.24
HR873170C [mm]
  round 1.8 hole 0.91: 1(0,-8.89) 2(-1.27,-6.35) 3(-2.54,-8.89) 4(-3.81,-6.35) 5(-5.08,-8.89) 6(-6.35,-6.35) 7(-7.62,-8.89) 9(-10.16,-8.89) 10(-11.43,-6.35)
  round 1.8 hole 1.02: 11(1.01,2.54) 12(1.01,4.57) 13(-12.44,2.54) 14(-12.44,4.57)
  round 0 hole 3.25 unplated: MH(-11.43,0) MH(0,0)
  round 3 hole 1.72: "Shield 1"(-13.59,-3.05) "Shield 2"(2.16,-3.05)
  silkscreen extent -14.96,-10.9 3.53,10.95, body extent -14.91,-10.85 3.5,10.9, height 14.76
IND-0402 [mm]
  rect 0.4x0.6 smd: 1(-0.35,0) 2(0.35,0)
  silkscreen extent -0.71,-0.46 0.71,0.46, body extent -0.5,-0.25 0.5,0.25, height 0.25
"IND-0603 (1608 Metric)" [mm] "0.063\" L x 0.032\" W (1.60mm x 0.80mm)"
  rect 0.6x0.8 smd: 1(-0.7,0) 2(0.7,0)
  silkscreen extent -0.2,-0.46 0.23,0.46, body extent -0.8,-0.4 0.8,0.4, height 0.78
Ind-0805 [mm] "Inductor 0805"
  rect 1.2x1.32 smd: 1(-1,0) 2(1,0)
  silkscreen extent -0.25,-0.69 0.25,0.69, body extent -1,-0.62 1,0.63, height 0.47
"IND-1008 (2520 Metric)" [mm]
  rect 0.65x2.2 smd: 1(-0.95,0) 2(0.95,0)
  silkscreen extent -0.41,-1.04 0.41,1.04, body extent -1.25,-1 1.25,1, height 1.2
LED-0402 [mm]
  rect 0.62x0.72 smd: 1(-0.475,0) 2(0.475,0)
  silkscreen extent -0.89,-0.51 1.55,0.51, body extent -0.5,-0.25 0.51,0.25, height 0.45
Q22FA12800090 [mm]
  rect 0.95x0.85 smd: 1(0,-1.15) 2(1.45,-1.15) 3(1.45,0) 4(0,0)
  silkscreen extent -0.7,-1.41 0.78,0.29, body extent -0.3,-1.36 1.7,0.24, height 0.65
Res-0402 [mil]
  rect 18x25 smd mask+2.17: 1(-18.5,0) 2(18.5,0)
  silkscreen extent -32,-17 32,16, body extent -23,-11 23,11, height 16
Res-0603 [mil]
  rect 30x35 smd: 1(-30,0) 2(30,0)
  silkscreen extent -48,-21 48,21, body extent -31,-17 31,17, height 18
RES-0805 [mil] "SMD 0805"
  rect 40x50 smd: 1(-40,0) 2(40,0)
  silkscreen extent -64,-29 64,29, body extent -39,-25 39,24, height 24
SK6812-EC20 [mm]
  rect 0.8x0.7 smd: 1(0.65,-0.6) 2(0.65,0.6) 3(-0.65,0.6) 4(-0.65,-0.6)
  silkscreen extent -1,-1 1.35,1, body extent -1,-1 1,1, height 0.65
SMA [mm]
  rect 2.5x1.7 smd: 1(-2,0) 2(2,0)
  silkscreen extent -4.45,-1.42 2.06,1.42, body extent -2.6,-1.3 2.6,1.3, height 2.4
SMB_ [mm]
  rect 2.8x2.4 smd: 1(-2.3,0) 2(2.3,0)
  silkscreen extent -2.21,-1.91 4.83,1.9, body extent -2.7,-1.8 2.7,1.8, height 2.3
SOD-123FL [mm]
  rect 1.34x1.8 smd: 1(-1.43,0) 2(1.43,0)
  silkscreen extent -3.25,-1.17 2.26,1.17, body extent -1.8,-0.82 1.8,0.82, height 0.95
SOIC-8 [mm]
  rect 1.55x0.6 smd: 1(-2.7,1.905) 2(-2.7,0.635) 3(-2.7,-0.635) 4(-2.7,-1.905) 5(2.7,-1.905) 6(2.7,-0.635) 7(2.7,0.635) 8(2.7,1.905)
  silkscreen extent -3.76,-2.49 1.99,2.49, body extent -3,-2.45 3,2.45, height 1.7
SOT-23 [mm] "TRANS NPN 40V 0.6A SOT23"
  rect 0.82x0.92 smd: 1(-0.95,-1) 2(0.95,-1) 3(0,1)
  silkscreen extent -1.68,-1.3 1.55,0.81, body extent -1.5,-1.25 1.5,1.25, height 1.05
Sot-23 [mm] "TRANS NPN 40V 0.6A SOT23"
  rect 0.82x0.92 smd: 1(-0.95,-1) 2(0.95,-1) 3(0,1)
  silkscreen extent -1.68,-1.3 1.55,0.81, body extent -1.5,-1.25 1.5,1.25, height 1.05
SOT-23-5 [mm]
  rect 1.1x0.6 smd: 1(-1.3,0.95) 2(-1.3,0) 3(-1.3,-0.95) 4(1.3,-0.95) 5(1.3,0.95)
  silkscreen extent -2.13,-1.5 0.88,1.5, body extent -1.4,-1.45 1.4,1.45, height 1.45
SOT-25-5 [mm]
  rect 1x0.7 smd: 1(-1.2,0.95) 2(-1.2,0) 3(-1.2,-0.95) 4(1.2,-0.95) 5(1.2,0.95)
  silkscreen extent -1.98,-1.55 0.76,1.55, body extent -1.19,-1.5 1.21,1.5, height 1.1
SOT-89-3 [mm]
  rect 0.58x1.73 smd: 1(-1.5,-1.132) 2(0,-1.132) 3(1.5,-1.132)
  rect 1.933x3.03 smd: 2(0,1.132)
  silkscreen extent -2.31,-1.27 2.31,1.73, body extent -2.25,-1.84 2.25,2.41, height 1.54
SOT-143-4_ [mm]
  rect 1.4x1.1 smd: 1(0,0)
  rect 1.4x0.8 smd: 2(0,-1.7) 3(2.2,-1.7) 4(2.2,0.2)
  silkscreen extent -0.99,-2.27 1.76,0.77, body extent -0.08,-2.21 2.29,0.71, height 1.22
Test-point [mil]
  oct 60x60 smd: 1(0,0)
  silkscreen extent -37,-37 37,37
TSSOP-20 [mm]
  rect 1.6x0.32 smd: 1(-2.8,2.925) 2(-2.8,2.275) 3(-2.8,1.625) 4(-2.8,0.975) 5(-2.8,0.325) 6(-2.8,-0.325) 7(-2.8,-0.975) 8(-2.8,-1.625) 9(-2.8,-2.275) 10(-2.8,-2.925) 11(2.8,-2.925) 12(2.8,-2.275) 13(2.8,-1.625) 14(2.8,-0.975) 15(2.8,-0.325) 16(2.8,0.325) 17(2.8,0.975) 18(2.8,1.625) 19(2.8,2.275) 20(2.8,2.925)
  silkscreen extent -3.88,-3.3 1.95,3.3, body extent -3.2,-3.25 3.2,3.25, height 1.2
TYPE-C-31-M-12_ [mm]
  rect 0.6x1.2 smd: A1/B12(-3.2,2.375) A4/B9(-2.4,2.375) B1/A12(3.2,2.375) B4/A9(2.4,2.375)
  rect 0.3x1.2 smd: A5(-1.25,2.375) A6(-0.25,2.375) A7(0.25,2.375) A8(1.25,2.375) B5(1.75,2.375) B6(0.75,2.375) B7(-0.75,2.375) B8(-1.75,2.375)
  round 0 hole 0.62 unplated: MH(-2.89,1.305) MH(2.89,1.305)
  oval 0.9x2 hole 0.6 slot 1.7 at 90 deg: S1(4.325,1.805) S4(-4.325,1.805)
  oval 0.9x1.7 hole 0.6 slot 1.4 at 90 deg: S2(4.325,-2.375) S3(-4.325,-2.375)
  silkscreen extent -4.5,-3.57 4.5,0.44, body extent -4.47,-5.01 4.47,2.89, height 3.31
UCD1A101MCL1GS [mm]
  rect 2.8x0.9 smd: 1(-2.3,0) 2(2.3,0)
  silkscreen extent -4.12,-3.3 3.3,3.3, body extent -3.5,-3.32 3.5,3.28, height 5.8
UD2C150M1010 [mm]
  rect 4.5x1.65 smd: 1(-4.5,0) 2(4.5,0)
  silkscreen extent -6.05,-5.2 5.15,5.2, body extent -5.45,-5.15 5.45,5.15, height 10.05
"Voltlink Target" [mm]
  rect 0.5x1.6 smd: 1(-2.5,-1.263) 2(-1.5,-1.262) 3(-0.5,-1.263) 4(0.5,-1.263) 5(1.5,-1.263) 6(2.5,-1.262)
  rect 1.2x1.8 smd: MP1(-3.8,1.263) MP2(3.8,1.262)
  silkscreen extent -4.06,-1.68 4.06,2.17, body extent -4,-1.49 4,2.11, height 4.25
VZH471M1CTR-0810 [mm]
  rect 3.6x1.26 smd: 1(-3.3,0) 2(3.3,0)
  silkscreen extent -5.43,-4.2 4.22,4.2, body extent -4.5,-4.15 4.5,4.15, height 10.05
YC164-FR-0710KL [mm]
  rect 0.9x0.65 smd: 1(0,0) 4(0,-2.48) 5(1.77,-2.48) 8(1.77,0)
  rect 0.9x0.53 smd: 2(0,-0.84) 3(0,-1.64) 6(1.77,-1.64) 7(1.77,-0.84)
  silkscreen extent -0.79,-2.96 1.77,0.48, body extent 0.08,-2.84 1.69,0.36, height 0.7
YTS-B003-2A [mm]
  rect 1.2x1.2 smd: 1(-2.1,-1.125) 2(2.1,-1.125)
  rect 1.5x0.7 smd: 3(3.45,1.125) 4(-3.45,1.125)
  round 1.5 hole 0.8: 5(3.75,0.475) 6(-3.75,0.475)
  round 0 hole 0.9 unplated: MH0(-1.15,0.175) MH1(1.15,0.175)
  silkscreen extent -3.68,-1.68 3.66,1.6, body extent -3.7,-1.37 3.7,2.36, height 3.59

## Part data
C1 C3 C35: library part CC0603KRX7R0BB104, "CAP CER 0.1UF 100V X7R 0603", Capacitance=100nF, Case Code (Imperial)=0603, Case Code (Metric)=1608, Dielectric=X7R, LCSC Part Number=C113803, Manufacturer=Yageo, Max Operating Temperature=125°C, Min Operating Temperature=-55°C, Package Quantity=4000, Resistor Type=Ceramic, Supplier Part Number 1=311-1523-1-ND, Tolerance=10%, Voltage Rating=100V, Case/Package=0603, Category="Ceramic Capacitors", ComponentLink1Description=https://datasheet.ciiva.com/6277/mlccorderingcode-6277030.pdf?src-supplier=Digi-Key, ComponentLink1URL=https://datasheet.ciiva.com/6277/mlccorderingcode-6277030.pdf?src-supplier=Digi-Key, ComponentLink2Description=https://datasheet.ciiva.com/6277/mlccorderingcode-6277081.pdf?src-supplier=Digi-Key, ComponentLink2URL=https://datasheet.ciiva.com/6277/mlccorderingcode-6277081.pdf?src-supplier=Digi-Key, ComponentLink3Description=https://datasheet.ciiva.com/6277/mlccorderingcode-6277082.pdf?src-supplier=Digi-Key, ComponentLink3URL=https://datasheet.ciiva.com/6277/mlccorderingcode-6277082.pdf?src-supplier=Digi-Key, Depth=0.8mm, Item Type=Capacitor, Lead Free="Lead Free", Length=0.063inch, Manufacturer Part Number=CC0603KRX7R0BB104, Mount="Surface Mount", Packaging="Tape and Reel", Pricing 1="1=0.19000, 10=0.13500, 50=0.07680, 100=0.06370, 500=0.04466, 1000=0.03696 (USD)", RoHS=Yes, RoHS Compliant=Yes, Series=CC, Stock 1=60476, Supplier 1=Digi-Key, Termination=SMD/SMT, Thickness=0.035inch, Voltage Rating (DC)=100V, Weight=7.1E-05oz, Width=0.031inch
C2: library part UD2C150M1010, "15uF 160V ±20% SMD,D10xL10.2mm Aluminum Electrolytic Capacitors - SMD ROHS", LCSC Part Number=C98557, Manufacturer="Honor Elec", Package=SMD,D10xL10.2mm, ComponentLink1Description=LCSC, ComponentLink1URL=https://www.lcsc.com/product-detail/Aluminum-Electrolytic-Capacitors-SMD_Honor-Elec-UD2C150M1010_C98557.html, Item Type=Capacitor, Manufacturer Part Number=UD2C150M1010
C4: library part CC0603JRNPO9BN120, "CAP CER 12PF 50V C0G/NPO 0603", Dielectric=C0G, Dielectric Material=Ceramic, Insulation Resistance=100GR, LCSC Part Number=C107034, Manufacturer=Yageo, Manufacturer Part Number=CC0603J*NPO9B*120, Supplier Part Number 1=311-1059-1-ND, Tolerance=5%, Voltage Rating (DC)=50V, Capacitance=12pF, ComponentLink1Description=http://www.kemet.com/kemet/web/homepage/kechome.nsf/file/F9080B_0402_Series_C0G/$file/F9080B_0402_Series_C0G.pdf?src-supplier=Element14, ComponentLink1URL=http://www.kemet.com/kemet/web/homepage/kechome.nsf/file/F9080B_0402_Series_C0G/$file/F9080B_0402_Series_C0G.pdf?src-supplier=Element14, ComponentLink2Description=http://www.farnell.com/datasheets/1372242.pdf?src-supplier=Element14, ComponentLink2URL=http://www.farnell.com/datasheets/1372242.pdf?src-supplier=Element14, Lead Free="Lead Free", Number of Pins=2, Packaging="Cut Tape", Pricing 1="1=0.1, 10=0.065, 100=0.0288, 500=0.0206, 1000=0.0162 (USD)", REACH SVHC="No SVHC", Stock 1=141041, Supplier 1=Digi-Key
C5: library part VZH471M1CTR-0810, "470uF 16V ±20% SMD,D8xL10mm Aluminum Electrolytic Capacitors - SMD ROHS", LCSC Part Number=C164069, Manufacturer=Lelon, Package=SMD,D8xL10mm, ComponentLink1Description=LCSC, ComponentLink1URL=https://www.lcsc.com/product-detail/Aluminum-Electrolytic-Capacitors-SMD_Lelon-VZH471M1CTR-0810_C164069.html, Item Type=Capacitor, Manufacturer Part Number=VZH471M1CTR-0810
C6 C7 C10 C12 C14 C15 C17 C20 C21 C23 C26 C27 C31 C32 C34 C39 C40 C41 C42 C43 C44 C55 C56: library part C1005X5R1H104K050BB, "CAP CER 0.1UF 50V X5R 0402", Capacitance=100nF, Case Code (Imperial)=0402, Case Code (Metric)=1005, Dielectric=X5R, Dielectric Material=Ceramic, LCSC Part Number=C2181865, Manufacturer=TDK, Max Operating Temperature=85°C, Min Operating Temperature=-55°C, Package Quantity=1, Supplier Part Number 1=445-5942-1-ND, Tolerance=10%, Voltage=50V, Case/Package=0402, ComponentLink1Description=https://product.tdk.com/info/en/catalog/spec/mlccspec_commercial_general_midvoltage_en.pdf?src-supplier=Digi-Key, ComponentLink1URL=https://product.tdk.com/info/en/catalog/spec/mlccspec_commercial_general_midvoltage_en.pdf?src-supplier=Digi-Key, ComponentLink2Description=http://www.tdk.co.jp/tefe02/e413_c.pdf?src-supplier=Future+Electronics, ComponentLink2URL=http://www.tdk.co.jp/tefe02/e413_c.pdf?src-supplier=Future+Electronics, ComponentLink3Description=https://www.verical.com/server-webapp/html/getDatasheet?partID=743571&src-supplier=Verical, ComponentLink3URL=https://www.verical.com/server-webapp/html/getDatasheet?partID=743571&src-supplier=Verical, ComponentLink4Description=http://www.tdk.co.jp/tefe02/e412_c.pdf?src-supplier=Avnet+Europe, ComponentLink4URL=http://www.tdk.co.jp/tefe02/e412_c.pdf?src-supplier=Avnet+Europe, Construction=Flat, Depth=0.5mm, Height=0.5mm, Lead Free="Lead Free", Length=1mm, Manufacturer Part Number=C1005X5R1H104K050BB, Mount="Surface Mount", Packaging="Tape and Reel", Pricing 1="1=0.12, 10=0.09, 50=0.049, 100=0.04, 500=0.02858, 1000=0.02245, 2500=0.02041, 5000=0.01878 (USD)", Radiation Hardening=No, REACH SVHC="No SVHC", Resistor Type=Ceramic, RoHS Compliant=Yes, Series=C, Stock 1=1455182, Supplier 1=Digi-Key, Termination=SMD/SMT, Thickness=0.022inch, Voltage Rating=50V, Voltage Rating (DC)=50V, Weight=2.3E-05oz, Width=0.02inch
C8: library part UCD1A101MCL1GS, "CAP ALUM 100UF 20% 10V SMD", Case/Package=Radial, LCSC Part Number=C340720, Leakage Current=10uA, Manufacturer=Nichicon, Max Operating Temperature=105°C, Min Operating Temperature=-55°C, Package Quantity=1000, Ripple Current=240mA, Supplier Part Number 1=493-14563-1-ND, Tolerance=20%, Voltage=10V, Capacitance=100uF, Category="Aluminum Electrolytic Capacitors", ComponentLink1Description=https://datasheet.ciiva.com/11776/0900766b80ebdadd-11776792.pdf?src-supplier=RSComponents, ComponentLink1URL=https://datasheet.ciiva.com/11776/0900766b80ebdadd-11776792.pdf?src-supplier=RSComponents, ComponentLink2Description=https://datasheet.ciiva.com/111/e-cd-111628.pdf?src-supplier=Digi-Key, ComponentLink2URL=https://datasheet.ciiva.com/111/e-cd-111628.pdf?src-supplier=Digi-Key, ComponentLink3Description=https://datasheet.ciiva.com/11686/e-cd-11686168.pdf?src-supplier=Avnet, ComponentLink3URL=https://datasheet.ciiva.com/11686/e-cd-11686168.pdf?src-supplier=Avnet, Construction=Cylindrical, Diameter=6.3mm, Dissipation Factor=0.19%, Height=5.8mm, Height - Seated (Max)=0.24inch, Impedance=360mR, Item Type=Capacitor, Length=5.8mm, Life (Hours)=2000Hour, Manufacturer Part Number=UCD1A101MCL1GS, Mount="Surface Mount", Packaging="Tape and Reel", Polarity=Polar, Pricing 1="1=0.51000, 10=0.35900, 50=0.27160, 100=0.23660, 500=0.17526 (USD)", Radiation Hardening=No, RoHS=Yes, RoHS Compliant=Yes, Series=CD, Stock 1=6029, Supplier 1=Digi-Key, Termination=SMD/SMT, Voltage Rating=10V, Voltage Rating (DC)=10V
C9 C24 C25 C38 C45: library part CC0603KRX5R7BB106, "CAP CER 10UF 16V X5R 0603", Case Code (Imperial)=0603, Case Code (Metric)=1608, LCSC Part Number=C2936601, Manufacturer=Yageo, Max Operating Temperature=85°C, Min Operating Temperature=-55°C, Supplier Part Number 1=311-3486-1-ND, Tolerance=10%, Voltage Rating=16V, Capacitance=10uF, Case/Package=0603, Category="Ceramic Capacitors", ComponentLink1Description=http://www.yageo.com/documents/recent/UPY-GPHC_X5R_4V-to-50V_25.pdf?src-supplier=Digi-Key, ComponentLink1URL=http://www.yageo.com/documents/recent/UPY-GPHC_X5R_4V-to-50V_25.pdf?src-supplier=Digi-Key, Item Type=Capacitor, Manufacturer Part Number=CC0603KRX5R7BB106, Mount="Surface Mount", Packaging="Cut Tape", Pricing 1="1=0.68000, 10=0.48000, 50=0.36300, 100=0.31610, 500=0.23416, 1000=0.19903 (USD)", RoHS=Yes, RoHS Compliant=Yes, Stock 1=240725, Supplier 1=Digi-Key
C11: library part CC1206KKX7RCBB472, "CAP CER 4700PF 1KV X7R 1206", Case Code (Imperial)=1206, Case Code (Metric)=3216, Dielectric=X7R, Dielectric Material=Ceramic, LCSC Part Number=C107198, Manufacturer=Yageo, Max Operating Temperature=125°C, Min Operating Temperature=-55°C, Supplier Part Number 1=7130131, Tolerance=10%, Voltage Rating=1kV, Capacitance=4.7nF, Case/Package=1206, Category="Ceramic Capacitors", ComponentLink1Description=https://datasheet.ciiva.com/13208/upy-gp-np0-16v-to-50v-8-13208693.pdf?src-supplier=Mouser, ComponentLink1URL=https://datasheet.ciiva.com/13208/upy-gp-np0-16v-to-50v-8-13208693.pdf?src-supplier=Mouser, ComponentLink2Description=https://datasheet.ciiva.com/11466/hv-11466701.pdf?src-supplier=Avnet, ComponentLink2URL=https://datasheet.ciiva.com/11466/hv-11466701.pdf?src-supplier=Avnet, Depth=1.6mm, Item Type=Capacitor, Lead Free="Lead Free", Length=3.2mm, Manufacturer Part Number=CC1206KKX7RCBB472, Mount="Surface Mount", Number of Pins=2, Packaging="Tape and Reel", Pricing 1="3000=0.02860, 9000=0.02750, 15000=0.02700, 45000=0.02600, 75000=0.02510 (USD)", Radiation Hardening=No, Resistor Type=Ceramic, RoHS=Yes, RoHS Compliant=Yes, Series=CC, Stock 1=180000, Supplier 1="Future Electronics", Termination=SMD/SMT, Thickness=0.057inch, Voltage Rating (DC)=1kV, Weight=0.000571oz, Width=0.063inch
C13 C16 C18 C19 C22: library part CC0402MRX5R6BB106, "CAP CER 10UF 10V X5R 0402", Case Code (Imperial)=0402, Case Code (Metric)=1005, LCSC Part Number=C962143, Manufacturer=Yageo, Max Operating Temperature=85°C, Min Operating Temperature=-55°C, Supplier Part Number 1=6097631, Tolerance=20%, Voltage Rating=10V, Capacitance=10uF, Case/Package=0402, Category="Ceramic Capacitors", ComponentLink1Description=http://www.yageo.com/documents/recent/UPY-GPHC_X5R_4V-to-50V_25.pdf?src-supplier=Digi-Key, ComponentLink1URL=http://www.yageo.com/documents/recent/UPY-GPHC_X5R_4V-to-50V_25.pdf?src-supplier=Digi-Key, Item Type=Capacitor, Manufacturer Part Number=CC0402MRX5R6BB106, Mount="Surface Mount", Packaging="Tape and Reel", Pricing 1="10000=0.02650, 20000=0.02590, 30000=0.02550, 40000=0.02530, 50000=0.02450 (USD)", RoHS=Yes, RoHS Compliant=Yes, Stock 1=80000, Supplier 1="Future Electronics"
C28: library part 0603B221K101NT, "100V 220pF X7R ±10% 0603 Multilayer Ceramic Capacitors MLCC - SMD/SMT ROHS", LCSC Part Number=C313082, Manufacturer=FH, Package=0603, ComponentLink1Description=LCSC, ComponentLink1URL=https://www.lcsc.com/product-detail/Multilayer-Ceramic-Capacitors-MLCC-SMD-SMT_FH-Guangdong-Fenghua-Advanced-Tech-0603B221K101NT_C313082.html, Item Type=Capacitor, Manufacturer Part Number=0603B221K101NT
C30: library part CC0603MRX5R6BB226, "CAP CER 22UF 10V X5R 0603", Case Code (Imperial)=0603, Case Code (Metric)=1608, Dielectric=X5R, LCSC Part Number=C109447, Manufacturer=Yageo, Max Operating Temperature=85°C, Min Operating Temperature=-55°C, Package Quantity=4000, Supplier Part Number 1=311-1819-1-ND, Tolerance=20%, Voltage Rating=10V, Capacitance=22uF, Case/Package=0603, Category="Ceramic Capacitors", ComponentLink1Description=http://www.mouser.com/ds/2/447/Yageo_UPY-GP_NP0_16V-to-50V_9-358835.pdf?src-supplier=Mouser, ComponentLink1URL=http://www.mouser.com/ds/2/447/Yageo_UPY-GP_NP0_16V-to-50V_9-358835.pdf?src-supplier=Mouser, ComponentLink2Description=http://www.yageo.com/documents/recent/UPY-GPHC_X5R_4V-to-50V_25.pdf?src-supplier=Digi-Key, ComponentLink2URL=http://www.yageo.com/documents/recent/UPY-GPHC_X5R_4V-to-50V_25.pdf?src-supplier=Digi-Key, Halogen Free="Halogen Free", Height=0.8mm, Item Type=Capacitor, Lead Free="Lead Free", Length=0.063inch, Manufacturer Part Number=CC0603MRX5R6BB226, Mount="Surface Mount", Packaging="Tape and Reel", Pricing 1="1=0.68000, 10=0.48000, 50=0.36300, 100=0.31610, 500=0.23416, 1000=0.19903 (USD)", RoHS=Yes, RoHS Compliant=Yes, Stock 1=19628, Supplier 1=Digi-Key, Termination=SMD/SMT, Thickness=0.035inch, Voltage Rating (DC)=10V, Weight=7.1E-05oz, Width=0.8mm
C33: library part CC0402KRX5R6BB105, "CAP CER 1UF 10V X5R 0402", Case Code (Imperial)=0402, Case Code (Metric)=1005, Dielectric=X5R, LCSC Part Number=C106254, Manufacturer=Yageo, Max Operating Temperature=85°C, Min Operating Temperature=-55°C, Package Quantity=1, Resistor Type=Ceramic, Supplier Part Number 1=603-CC402KRX5R6BB105, Tolerance=10%, Voltage Rating=10V, Capacitance=1uF, Case/Package=0402, Category="Ceramic Capacitors", ComponentLink1Description=https://datasheet.ciiva.com/176/upy-gphc-x5r-4v-to-50v-12-176704.pdf?src-supplier=Digi-Key, ComponentLink1URL=https://datasheet.ciiva.com/176/upy-gphc-x5r-4v-to-50v-12-176704.pdf?src-supplier=Digi-Key, ComponentLink2Description=https://datasheet.ciiva.com/176/mlccorderingcode-176705.pdf?src-supplier=Digi-Key, ComponentLink2URL=https://datasheet.ciiva.com/176/mlccorderingcode-176705.pdf?src-supplier=Digi-Key, ComponentLink3Description=https://datasheet.ciiva.com/176/mlccorderingcode-176706.pdf?src-supplier=Digi-Key, ComponentLink3URL=https://datasheet.ciiva.com/176/mlccorderingcode-176706.pdf?src-supplier=Digi-Key, Construction=Flat, Depth=0.5mm, Dissipation Factor=15%, Halogen Free="Halogen Free", Height=0.5mm, Lead Free="Lead Free", Length=1mm, Manufacturer Part Number=CC0402KRX5R6BB105, Mount="Surface Mount", Number of Pins=2, Packaging="Tape and Reel", Pricing 1="1=0.11000, 10=0.05500, 50=0.05500, 100=0.03300, 500=0.02700, 1000=0.02200, 2500=0.02100, 10000=0.01800 (USD)", Radiation Hardening=No, REACH SVHC="No SVHC", RoHS=Yes, RoHS Compliant=Yes, Series=CC, Stock 1=6711367, Supplier 1=Mouser, Termination=SMD/SMT, Thickness=0.022inch, Voltage Rating (DC)=10V, Width=0.02inch
C36 C37: library part CC0805MKX5R8BB226, "CAP CER 22UF 25V X5R 0805", Case Code (Imperial)=0805, Case Code (Metric)=2012, Dielectric=X5R, LCSC Part Number=C784585, Manufacturer=Yageo, Max Operating Temperature=85°C, Min Operating Temperature=-55°C, Package Quantity=3000, Supplier Part Number 1=311-1903-1-ND, Tolerance=20%, Voltage Rating=25V, Capacitance=22uF, Case/Package=0805, Category="Ceramic Capacitors", ComponentLink1Description=http://www.mouser.com/ds/2/447/Yageo_UPY-GP_NP0_16V-to-50V_9-358835.pdf?src-supplier=Mouser, ComponentLink1URL=http://www.mouser.com/ds/2/447/Yageo_UPY-GP_NP0_16V-to-50V_9-358835.pdf?src-supplier=Mouser, ComponentLink2Description=http://www.yageo.com/documents/recent/UPY-GPHC_X5R_4V-to-50V_25.pdf?src-supplier=Digi-Key, ComponentLink2URL=http://www.yageo.com/documents/recent/UPY-GPHC_X5R_4V-to-50V_25.pdf?src-supplier=Digi-Key, Halogen Free="Halogen Free", Height=1.25mm, Item Type=Capacitor, Lead Free="Lead Free", Length=0.079inch, Manufacturer Part Number=CC0805MKX5R8BB226, Mount="Surface Mount", Packaging="Tape and Reel", Pricing 1="1=0.47000, 10=0.33300, 50=0.25140, 100=0.21900, 500=0.16222, 1000=0.13789 (USD)", RoHS=Yes, RoHS Compliant=Yes, Stock 1=64970, Supplier 1=Digi-Key, Termination=SMD/SMT, Thickness=0.057inch, Voltage Rating (DC)=25V, Weight=0.000194oz, Width=0.049inch
C46 C47: library part 0603B682K500NT, "50V 6.8nF X7R ±10% 0603", LCSC Part Number=C1631, Manufacturer=FH, ComponentLink1Description=LCSC, ComponentLink1URL=https://www.lcsc.com/product-detail/Multilayer-Ceramic-Capacitors-MLCC-SMD-SMT_FH-Guangdong-Fenghua-Advanced-Tech-0603B682K500NT_C1631.html, Item Type=Capacitor, Manufacturer Part Number=0603B682K500NT
C48 C50: library part CC0603JRNPO9BN103, "CAP CER 10000PF 50V C0G/NPO 0603", Case/Package=0603, LCSC Part Number=C389113, Manufacturer=Yageo, Max Operating Temperature=125°C, Min Operating Temperature=-55°C, Tolerance=5%, Voltage Rating=50V, Capacitance=10nF, Category="Ceramic Capacitors", ComponentLink1Description=http://www.yageo.com/documents/recent/UPY-GP_NP0_16V-to-50V_16.pdf?src-supplier=Digi-Key, ComponentLink1URL=http://www.yageo.com/documents/recent/UPY-GP_NP0_16V-to-50V_16.pdf?src-supplier=Digi-Key, ComponentLink2Description=http://www.yageo.com/exep/pages/download/literatures/ProductSelectionGuide%202014_Final_2.pdf?src-supplier=Digi-Key, ComponentLink2URL=http://www.yageo.com/exep/pages/download/literatures/ProductSelectionGuide%202014_Final_2.pdf?src-supplier=Digi-Key, Item Type=Capacitor, Length=0.063inch, Manufacturer Part Number=CC0603JRNPO9BN103, Mount="Surface Mount", Packaging="Tape and Reel", Pricing 1="1=0.42340, 10=0.29770, 25=0.25590, 100=0.19550, 250=0.19360, 500=0.14320, 1000=0.12060, 3000=0.11930 (USD)", RoHS=Yes, RoHS Compliant=Yes, Stock 1=5425, Supplier 1="Arrow Electronics", Supplier Part Number 1=CC0603JRNPO9BN103, Thickness=0.035inch, Width=0.031inch
C49: library part CC0603KRX7R9BB223, "CAP CER 0.022UF 50V X7R 0603", Case Code (Imperial)=0603, Case Code (Metric)=1608, Dielectric=X7R, Dielectric Material=Ceramic, Insulation Resistance=100GR, LCSC Part Number=C106222, Manufacturer=Yageo, Max Operating Temperature=125°C, Min Operating Temperature=-55°C, Package Quantity=1, Supplier Part Number 1=311-1370-1-ND, Tolerance=10%, Voltage=50V, Capacitance=22nF, Case/Package=0603, Category="Ceramic Capacitors", ComponentLink1Description=https://datasheet.ciiva.com/8033/70765-8033869.pdf?src-supplier=Element14, ComponentLink1URL=https://datasheet.ciiva.com/8033/70765-8033869.pdf?src-supplier=Element14, ComponentLink2Description=https://datasheet.ciiva.com/28450/1489800-28450639.pdf?src-supplier=Element14, ComponentLink2URL=https://datasheet.ciiva.com/28450/1489800-28450639.pdf?src-supplier=Element14, ComponentLink3Description=https://datasheet.ciiva.com/8033/1489800-8033867.pdf?src-supplier=Element14, ComponentLink3URL=https://datasheet.ciiva.com/8033/1489800-8033867.pdf?src-supplier=Element14, ComponentLink4Description=https://datasheet.ciiva.com/8033/1489800-8033865.pdf?src-supplier=Element14, ComponentLink4URL=https://datasheet.ciiva.com/8033/1489800-8033865.pdf?src-supplier=Element14, ComponentLink5Description=https://datasheet.ciiva.com/156/mlccorderingcode-156178.pdf?src-supplier=Digi-Key, ComponentLink5URL=https://datasheet.ciiva.com/156/mlccorderingcode-156178.pdf?src-supplier=Digi-Key, ComponentLink6Description=https://datasheet.ciiva.com/156/mlccorderingcode-156177.pdf?src-supplier=Digi-Key, ComponentLink6URL=https://datasheet.ciiva.com/156/mlccorderingcode-156177.pdf?src-supplier=Digi-Key, ComponentLink7Description=https://datasheet.ciiva.com/156/mlccorderingcode-156179.pdf?src-supplier=Digi-Key, ComponentLink7URL=https://datasheet.ciiva.com/156/mlccorderingcode-156179.pdf?src-supplier=Digi-Key, ComponentLink8Description=https://datasheet.ciiva.com/11464/upy-gphc-x7r-6-3v-to-50v-8-11464741.pdf?src-supplier=Avnet, ComponentLink8URL=https://datasheet.ciiva.com/11464/upy-gphc-x7r-6-3v-to-50v-8-11464741.pdf?src-supplier=Avnet, Depth=0.8mm, Halogen Free="Halogen Free", Height=0.8mm, Item Type=Capacitor, Lead Free="Lead Free", Length=1.6mm, Manufacturer Part Number=CC0603KRX7R9BB223, Mount="Surface Mount", Number of Pins=2, Packaging="Tape and Reel", Pricing 1="1=0.10000, 10=0.05500, 50=0.03020, 100=0.02460, 500=0.01760, 1000=0.01383 (USD)", Radiation Hardening=No, REACH SVHC="No SVHC", Resistor Type=Ceramic, RoHS=Yes, RoHS Compliant=Yes, Series=CC, Stock 1=119735, Supplier 1=Digi-Key, Termination=SMD/SMT, Thickness=0.035inch, Voltage Rating=50V, Voltage Rating (DC)=50V, Width=0.031inch
C51: library part CC0603KRX5R6BB475, "CAP CER 4.7UF 10V X5R 0603", Case Code (Imperial)=0603, Case Code (Metric)=1608, Dielectric=X5R, LCSC Part Number=C109456, Manufacturer=Yageo, Max Operating Temperature=85°C, Min Operating Temperature=-55°C, Package Quantity=1, Resistor Type=Ceramic, Supplier Part Number 1=603-CC603KRX5R6BB475, Tolerance=10%, Voltage Rating=10V, Capacitance=4.7uF, Case/Package=0603, Category="Ceramic Capacitors", ComponentLink1Description=https://datasheet.ciiva.com/8033/1525783-8033802.pdf?src-supplier=Element14, ComponentLink1URL=https://datasheet.ciiva.com/8033/1525783-8033802.pdf?src-supplier=Element14, ComponentLink2Description=https://datasheet.ciiva.com/8033/1525783-8033798.pdf?src-supplier=Element14, ComponentLink2URL=https://datasheet.ciiva.com/8033/1525783-8033798.pdf?src-supplier=Element14, ComponentLink3Description=https://datasheet.ciiva.com/179/mlccorderingcode-179705.pdf?src-supplier=Digi-Key, ComponentLink3URL=https://datasheet.ciiva.com/179/mlccorderingcode-179705.pdf?src-supplier=Digi-Key, ComponentLink4Description=https://datasheet.ciiva.com/179/mlccorderingcode-179704.pdf?src-supplier=Digi-Key, ComponentLink4URL=https://datasheet.ciiva.com/179/mlccorderingcode-179704.pdf?src-supplier=Digi-Key, ComponentLink5Description=https://datasheet.ciiva.com/179/mlccorderingcode-179706.pdf?src-supplier=Digi-Key, ComponentLink5URL=https://datasheet.ciiva.com/179/mlccorderingcode-179706.pdf?src-supplier=Digi-Key, ComponentLink6Description=https://datasheet.ciiva.com/11586/upy-gphc-x5r-4v-to-50v-12-11586314.pdf?src-supplier=Avnet, ComponentLink6URL=https://datasheet.ciiva.com/11586/upy-gphc-x5r-4v-to-50v-12-11586314.pdf?src-supplier=Avnet, Construction=Flat, Depth=0.8mm, Halogen Free="Halogen Free", Height=0.8mm, Lead Free="Lead Free", Length=1.6mm, Manufacturer Part Number=CC0603KRX5R6BB475, Mount="Surface Mount", Packaging="Tape and Reel", Pricing 1="1=0.27000, 10=0.11200, 50=0.11200, 100=0.09500, 500=0.06500, 1000=0.05800, 2000=0.05600, 4000=0.04700, 8000=0.04000, 10000=0.04000 (USD)", Radiation Hardening=No, REACH SVHC=Unknown, RoHS=Yes, RoHS Compliant=Yes, Series=CC, Stock 1=479165, Supplier 1=Mouser, Termination=SMD/SMT, Thickness=0.035inch, Voltage Rating (DC)=10V, Width=0.8mm
C52 C53: library part GRM0335C1H120JA01D, "Multilayer Ceramic Capacitor, 12 pF, 50 V, ± 5%, C0G (NP0), 0201 [0603 Metric]", Case Code (Imperial)=0201, Case Code (Metric)=0603, Dielectric=C0G, LCSC Part Number=C85890, Manufacturer=Murata, Max Operating Temperature=125°C, Min Operating Temperature=-55°C, Package Quantity=1, Temperature Coefficient=30ppm/°C, Tolerance=5%, Voltage=50V, Capacitance=12pF, Case/Package=0201, Category="Ceramic Capacitors", ComponentLink1Description=https://datasheet.ciiva.com/6271/partnumbering-e-01-6271190.pdf?src-supplier=Digi-Key, ComponentLink1URL=https://datasheet.ciiva.com/6271/partnumbering-e-01-6271190.pdf?src-supplier=Digi-Key, ComponentLink2Description=https://datasheet.ciiva.com/6271/partnumbering-e-01-6271189.pdf?src-supplier=Digi-Key, ComponentLink2URL=https://datasheet.ciiva.com/6271/partnumbering-e-01-6271189.pdf?src-supplier=Digi-Key, ComponentLink3Description=https://datasheet.ciiva.com/6271/partnumbering-e-01-6271194.pdf?src-supplier=Digi-Key, ComponentLink3URL=https://datasheet.ciiva.com/6271/partnumbering-e-01-6271194.pdf?src-supplier=Digi-Key, ComponentLink4Description=https://datasheet.ciiva.com/5437/product-5437157.pdf?src-supplier=Mouser, ComponentLink4URL=https://datasheet.ciiva.com/5437/product-5437157.pdf?src-supplier=Mouser, Depth=0.3mm, Height=0.3mm, Item Type=Capacitor, Lead Free="Lead Free", Length=0.024inch, Manufacturer Part Number=GRM0335C1H120JA01D, Material=Ceramic, Mount="Surface Mount", Packaging="Tape and Reel", Pricing 1="500=0.002, 1000=0.005, 2500=0.004, 5000=0.004 (GBP)", RoHS=Yes, RoHS Compliant=Yes, Series=GRM, Stock 1=19000, Supplier 1=Rs, Termination=SMD/SMT, Voltage Rating=50V, Voltage Rating (DC)=50V, Width=0.012inch